# Altium PCB 16MV1.PcbDoc (part 1 of 3)
Units mm, origin at the board's own origin, x right, y up, seen from the top; angles counter-clockwise.
Board outline 48 x 32 mm, 4 copper layers (Top Layer, Layer 1, Layer 2, Bottom Layer), stack 1.583 mm thick; 197 components, 152 nets, 778 pads, 395 vias.
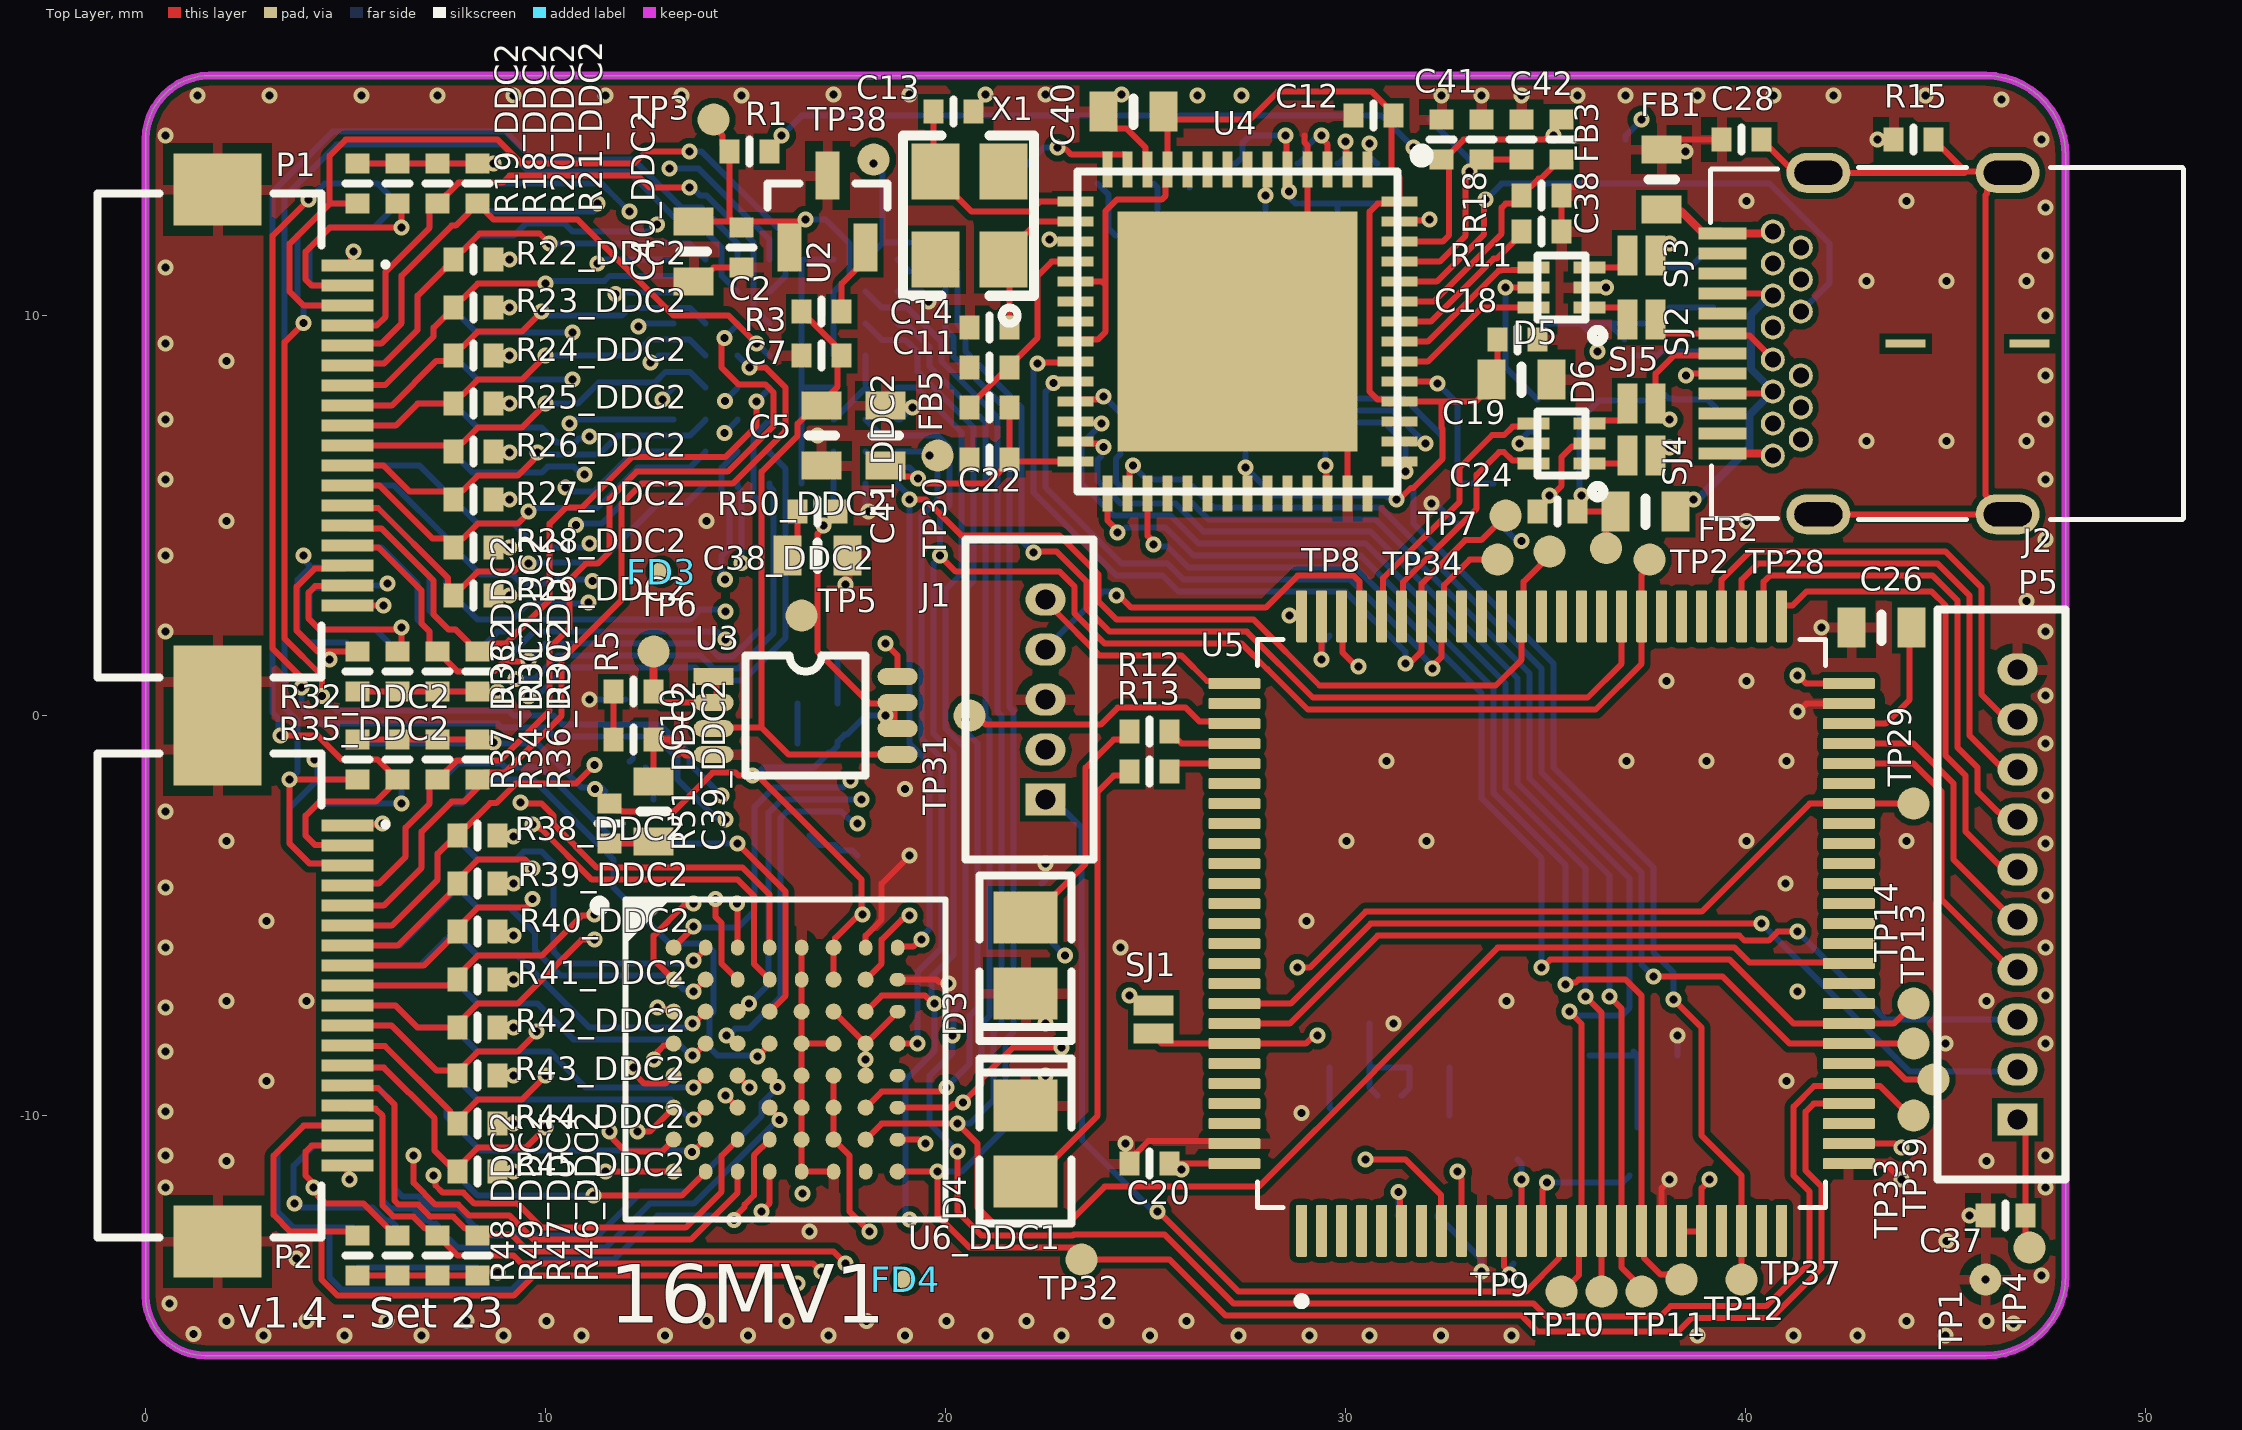
[diagram p0: Top Layer view]
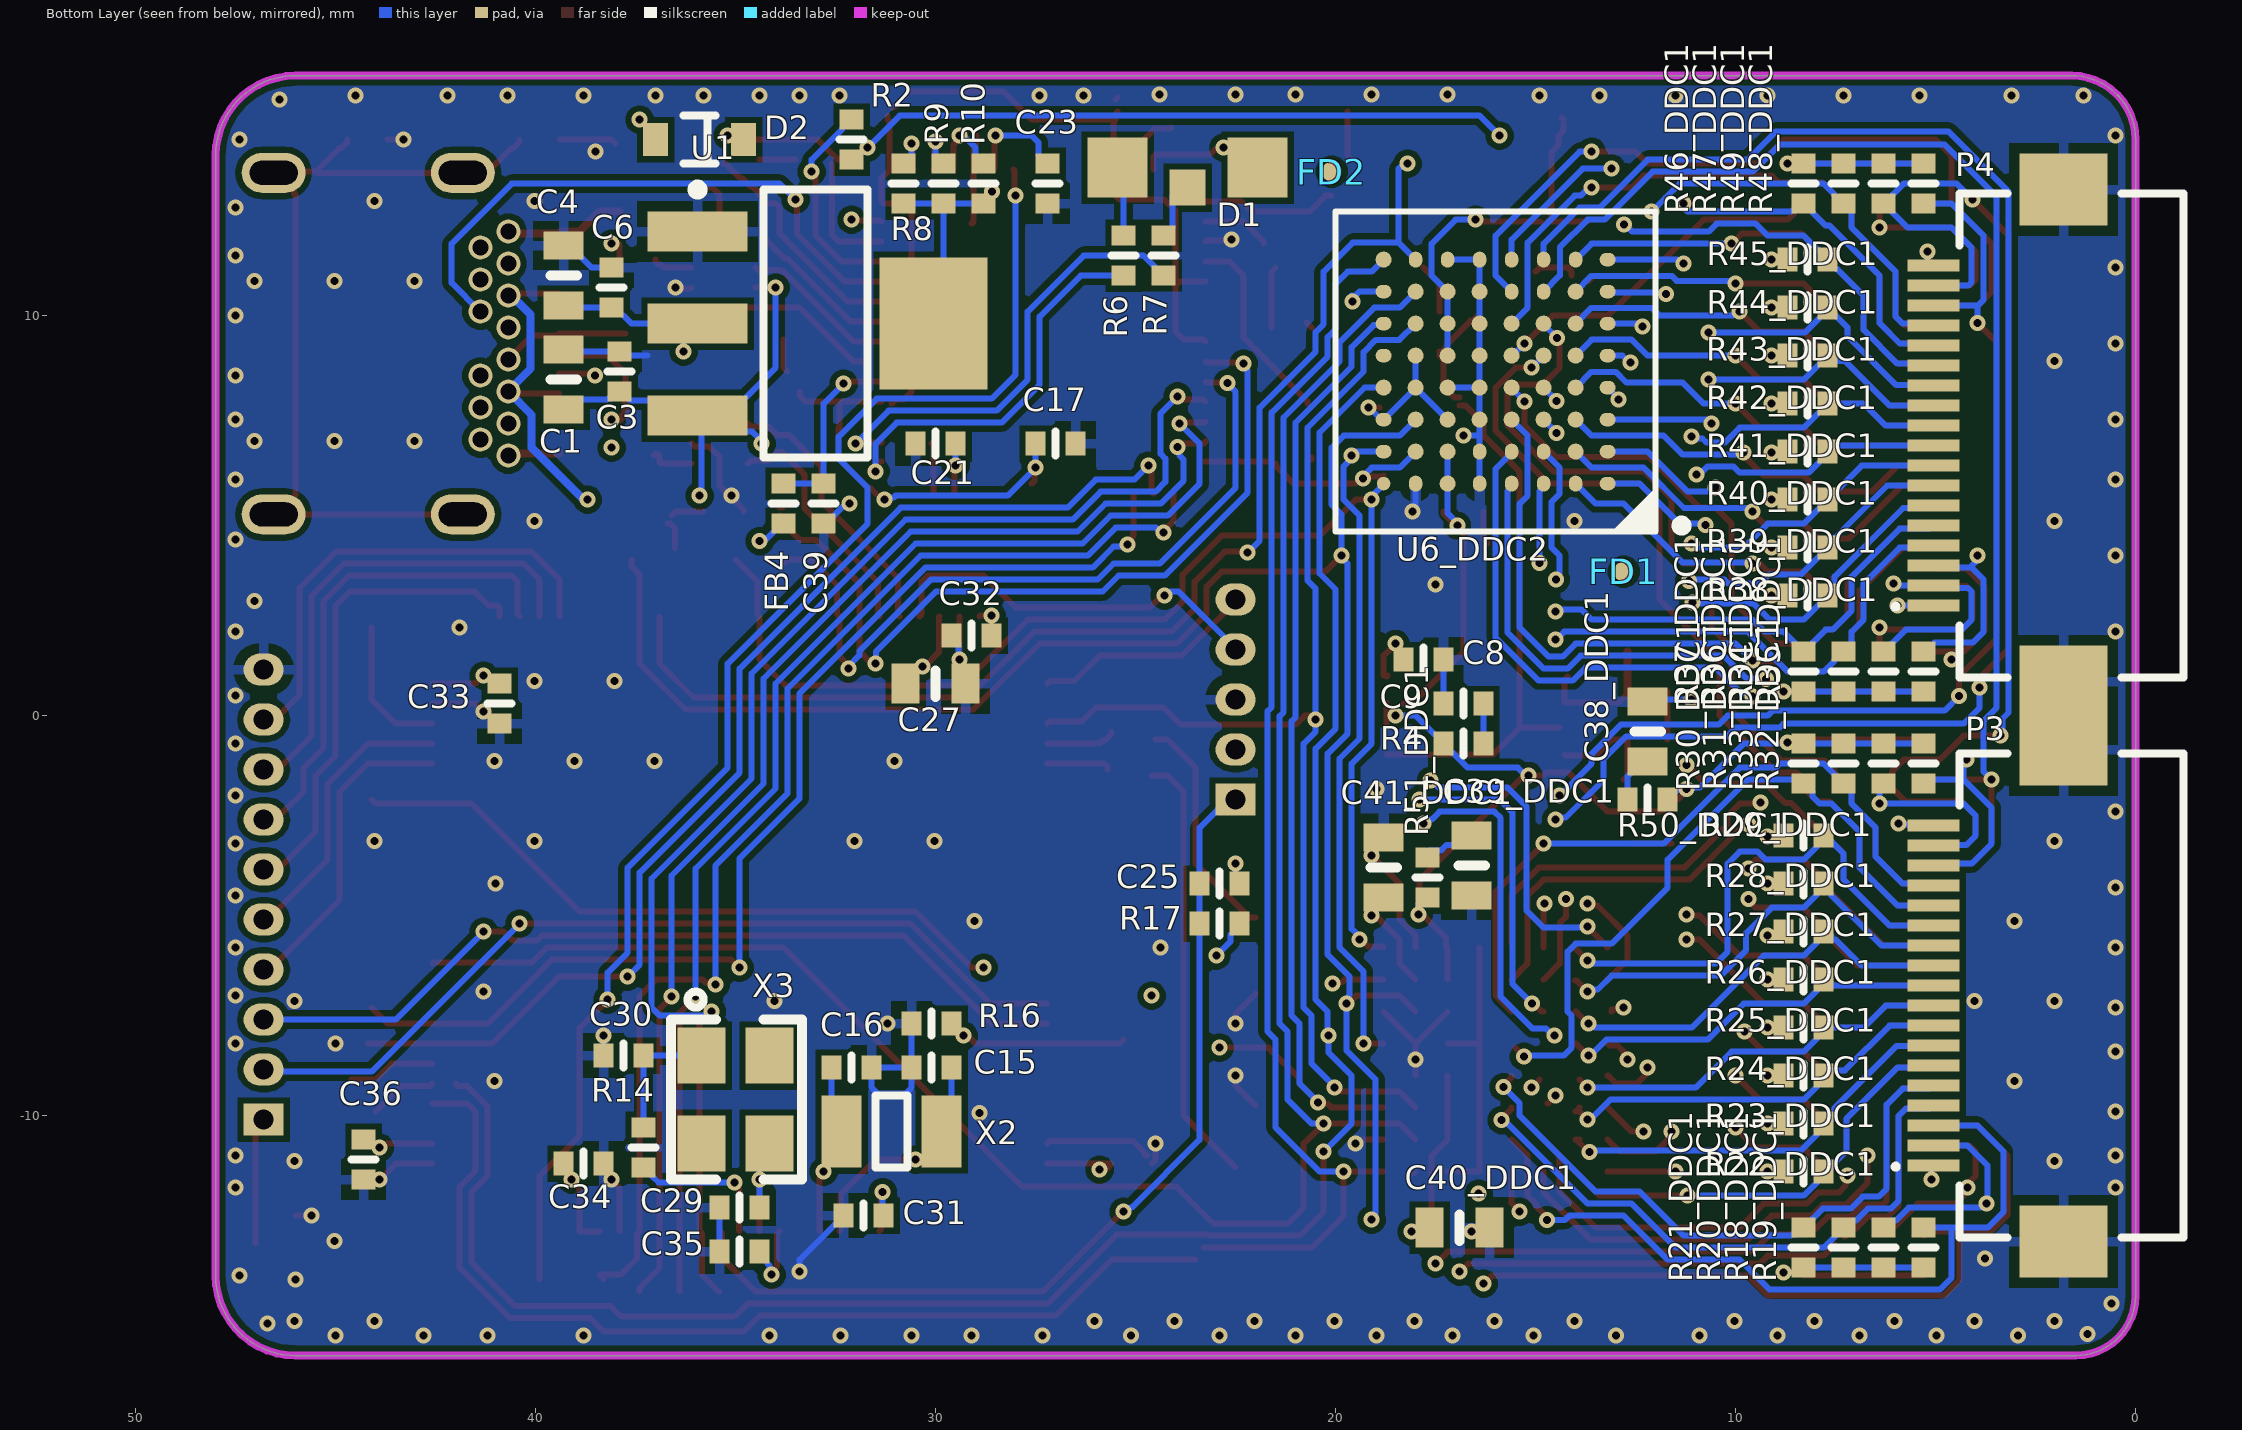
[diagram p1: Bottom Layer view, seen from below]
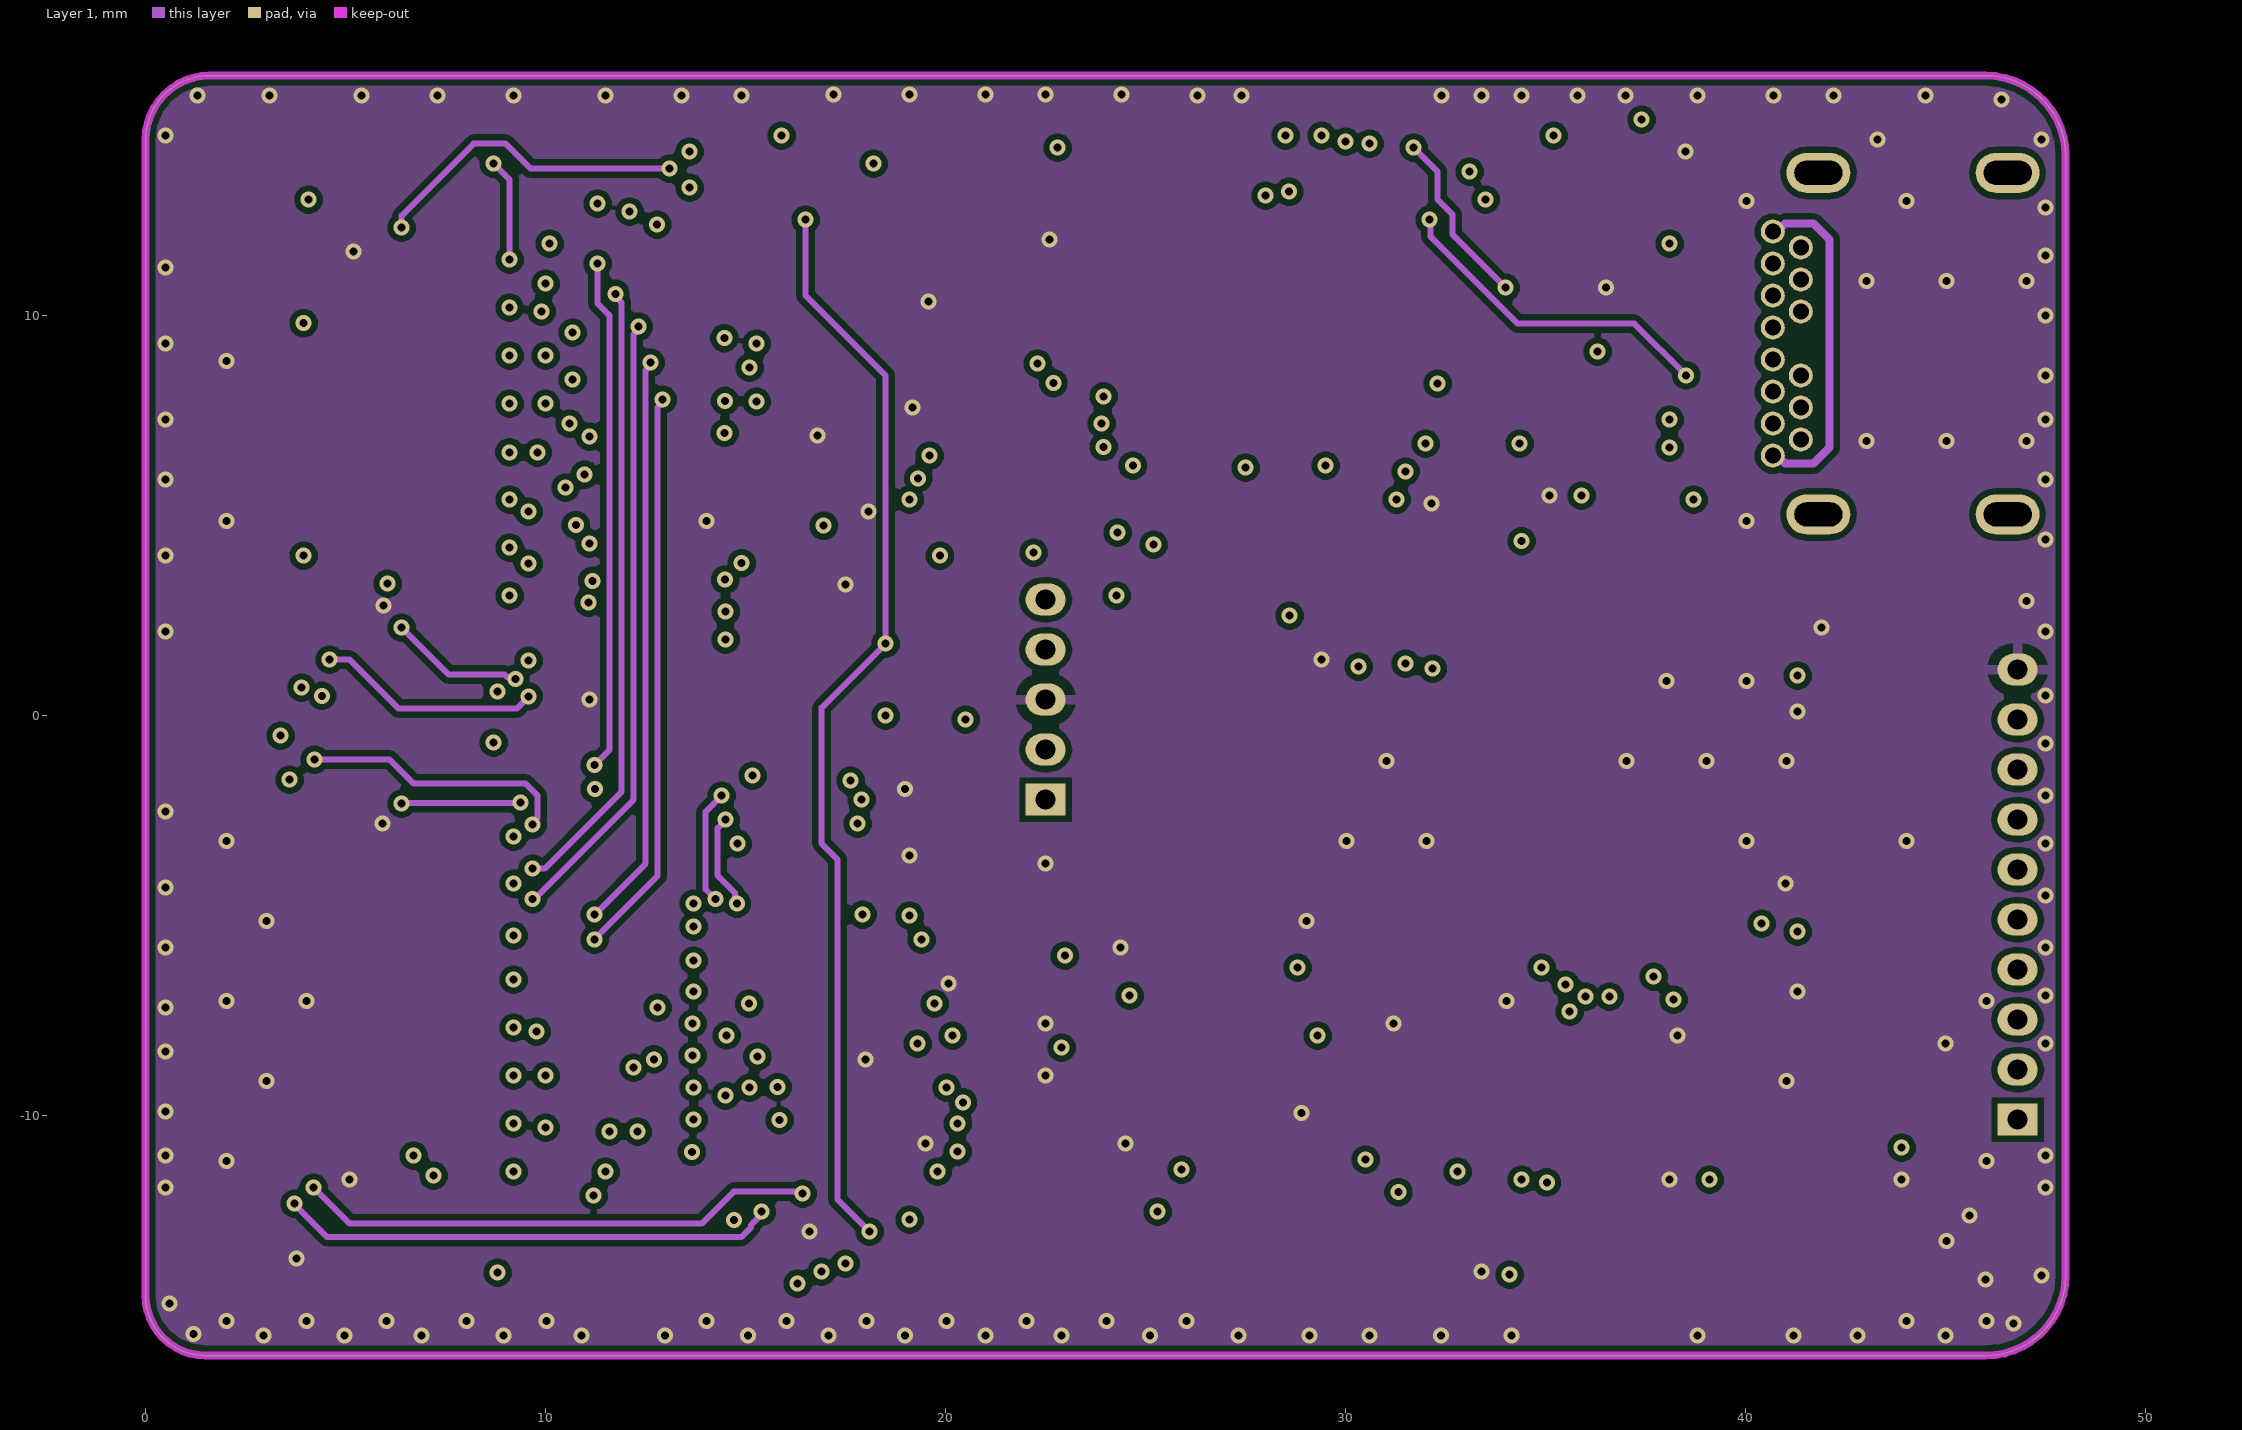
[diagram p2: Layer 1]
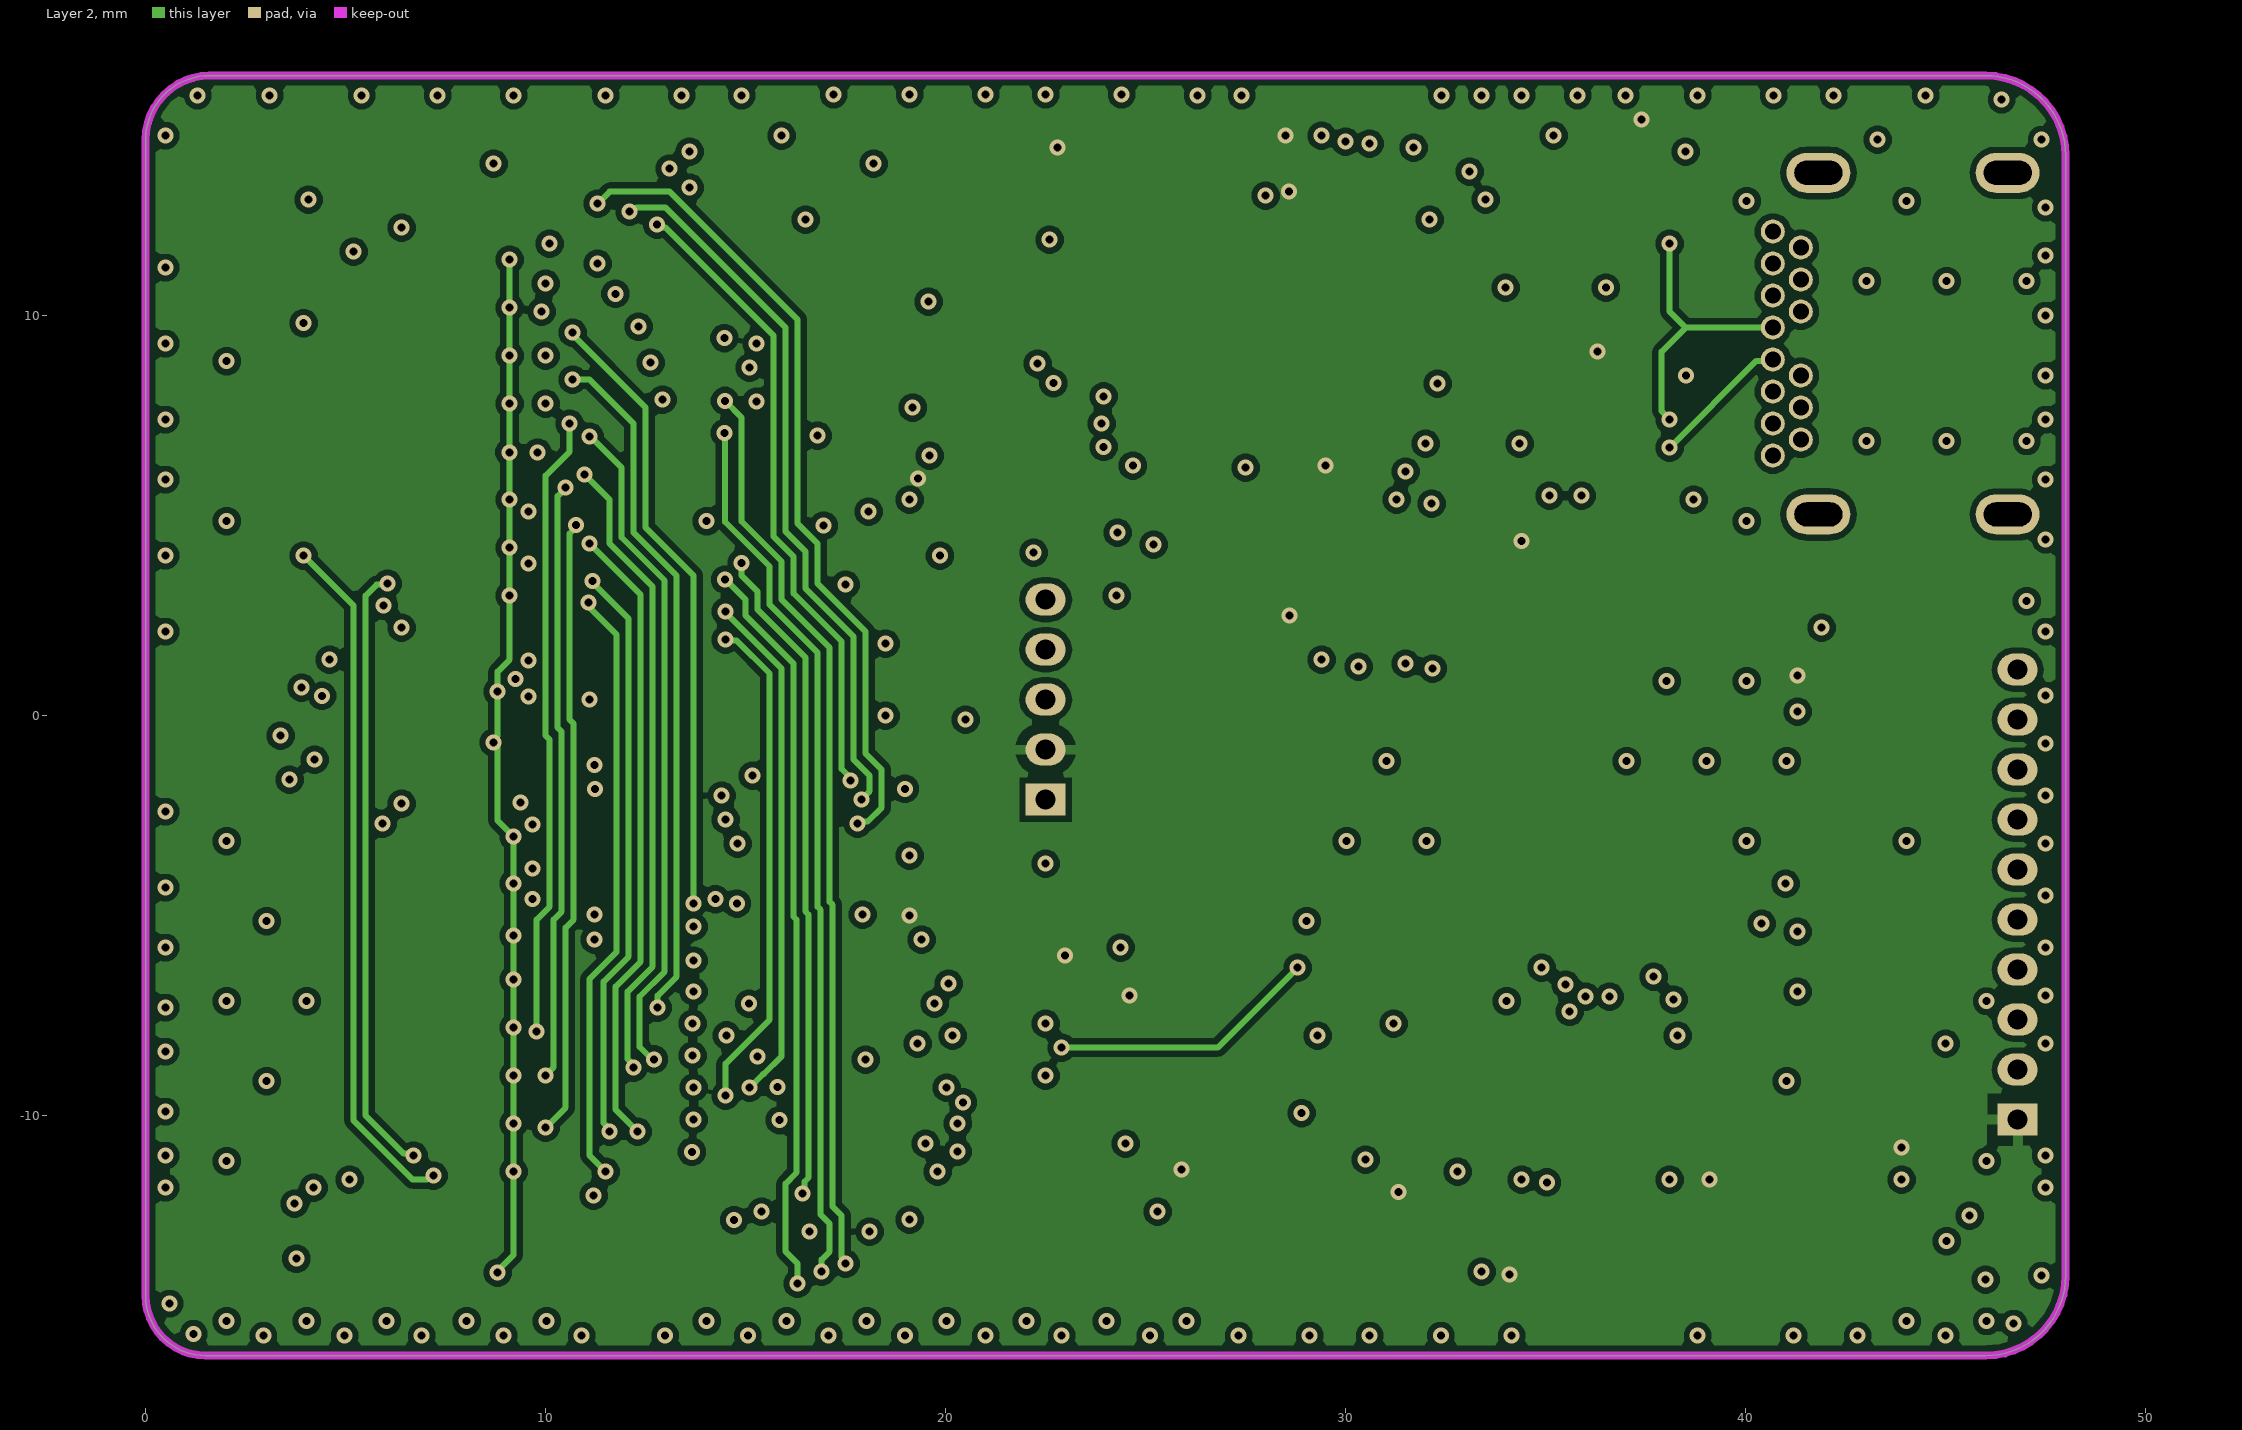
[diagram p3: Layer 2]

## Layer stack, top to bottom
Top Solder: solder mask 0.0102, Solder Resist, Dk 3.5
Top Layer: signal copper 0.0356
Dielectric 1: prepreg 0.0711, PP-006, Dk 4.1
Layer 1: signal copper 0.035
Dielectric1: core 1.3, FR-4, Dk 4.8
Layer 2: signal copper 0.035
Dielectric 2: prepreg 0.0711, PP-006, Dk 4.1
Bottom Layer: signal copper 0.0356
Bottom Solder: solder mask 0.0102, Solder Resist, Dk 3.5

## Board outline
1.5,-16 cw(c1.5,-14.5) 0,-14.5 0,14.4 cw(c1.6,14.4) 1.6,16 46,16 cw(c46,14) 48,14 48,-14 cw(c46,-14) 46,-16

## Design rules (kind name [scope] priority, off if disabled: settings)
Clearance [All] p1: gap=0.15 ignorepadtopadclearanceinfootprint=FALSE
DiffPairsRouting [All] p1: maxlimit=0.3 minlimit=0.2 mostfreqgap=0.2 toplayer_minwidth=0.2 toplayer_maxwidth=1 toplayer_prefwidth=0.2 midlayer1_minwidth=0.2 midlayer1_maxwidth=1 midlayer1_prefwidth=0.2 midlayer2_minwidth=0.2 midlayer2_maxwidth=1 midlayer2_prefwidth=0.2 bottomlayer_minwidth=0.2 bottomlayer_maxwidth=1 bottomlayer_prefwidth=0.2 maxuncoupledlength=12.7
HoleSize [All] p1: absolutevalues=TRUE maxlimit=10 minlimit=0.025 maxpercent=80.000 minpercent=20.000
MinimumSolderMaskSliver [All] p1: minsoldermaskwidth=0
PolygonConnect PolygonConnect_1 [(InComponentClass('All Components'))] p1: connectstyle=Relief reliefconductorwidth=0.254 reliefentries=4 polygonreliefangle="90 Angle" airgapwidth=0.254
PolygonConnect [All] p2: connectstyle=Direct reliefconductorwidth=0.254 reliefentries=4 polygonreliefangle="90 Angle" airgapwidth=0.254
RoutingVias [All] p1: holewidth=0.3 width=0.6 viastyle="Through Hole" minholewidth=0.2 minwidth=0.4 maxholewidth=1 maxwidth=2
SilkToSilkClearance [All] p1: silktosilkclearance=-10
SilkToSolderMaskClearance SilkscreenOverComponentPads [IsPad] p1: minsilkscreentomaskgap=-10 clearancetoexposedcopper=TRUE
SolderMaskExpansion [All] p1: expansion=0.102 istentingtop=FALSE
Width [All] p1: maxlimit=2 minlimit=0.15 preferedwidth=0.3
25 further rules are at their usual default settings.

## Classes and differential pairs
component class 16MV1: C1 C2 C3 C4 C5 C6 C7 C8 C9 C10 C11 C12 C13 C14 C15 C16 C17 C18 C19 C20 C21 C22 C23 C24 C25 C26 C27 C28 C29 C30 C31 C32 C33 C34 C35 C36 C37 C38 C39 C40 C41 C42 D1 D2 D3 D4 D5 D6 FB1 FB2 FB3 FB4 FB5 FD1 FD2 FD3 FD4 J1 J2 P1 P2 P3 P4 R1 R2 R3 R4 R5 R6 R7 R8 R9 R10 R11 R12 R13 R14 R15 R16 R17 R18 SJ1 SJ2 SJ3 SJ4 SJ5 TP1 TP2 TP3 TP4 TP5 TP6 TP7 TP8 TP9 TP10 TP11 TP12 TP13 TP14 TP28 TP29 TP30 TP31 TP32 TP33 TP34 TP37 TP38 TP39 U1 U2 U3 U4 U5 X1 X2 X3
channel class DDC: DDC1 DDC2
component class DDC1: C38_DDC1 C39_DDC1 C40_DDC1 C41_DDC1 R18_DDC1 R19_DDC1 R20_DDC1 R21_DDC1 R22_DDC1 R23_DDC1 R24_DDC1 R25_DDC1 R26_DDC1 R27_DDC1 R28_DDC1 R29_DDC1 R30_DDC1 R31_DDC1 R32_DDC1 R33_DDC1 R34_DDC1 R35_DDC1 R36_DDC1 R37_DDC1 R38_DDC1 R39_DDC1 R40_DDC1 R41_DDC1 R42_DDC1 R43_DDC1 R44_DDC1 R45_DDC1 R46_DDC1 R47_DDC1 R48_DDC1 R49_DDC1 R50_DDC1 R51_DDC1 U6_DDC1
component class DDC2: C38_DDC2 C39_DDC2 C40_DDC2 C41_DDC2 R18_DDC2 R19_DDC2 R20_DDC2 R21_DDC2 R22_DDC2 R23_DDC2 R24_DDC2 R25_DDC2 R26_DDC2 R27_DDC2 R28_DDC2 R29_DDC2 R30_DDC2 R31_DDC2 R32_DDC2 R33_DDC2 R34_DDC2 R35_DDC2 R36_DDC2 R37_DDC2 R38_DDC2 R39_DDC2 R40_DDC2 R41_DDC2 R42_DDC2 R43_DDC2 R44_DDC2 R45_DDC2 R46_DDC2 R47_DDC2 R48_DDC2 R49_DDC2 R50_DDC2 R51_DDC2 U6_DDC2
differential pair USB: +USB_P -USB_N
differential pair D: +D_P -D_N

## Components (designator, comment, footprint, x,y, rotation, side; value= is the part's Value field where it differs from the comment)
C1 "10u" 0603 39.3,8.4 r90 bottom
C2 "100n" 0402 14.9,11.7 r270 top
C3 "100n" 0402 37.9,8.6 r90 bottom
C4 "10u" 0603 39.3,11 r90 bottom
C5 "10u" 0603 16.9,7 r270 top
C6 "100n" 0402 38.1,10.7 r90 bottom
C7 "100n" 0402 16.9,9 r180 top
C8 "100n" 0402 17.8,1.4 r180 bottom
C9 "100n" 0402 16.8,0.3 r0 bottom
C10 "100n" 0402 12.2,-0.6 r0 top
C11 "100n" 0402 21.1,8.7 r180 top
C12 "100n" 0402 30.7,15 r180 top
C13 "18p" 0402 20.2,15.1 r180 top
C14 "18p" 0402 21.1,9.7 r0 top
C15 "18p" 0402 30.1,-8.8 r0 bottom
C16 "18p" 0402 32.1,-8.8 r180 bottom
C17 "100n" 0402 27,6.8 r180 bottom
C18 "100n" 0402 34.3,9.4 r0 top
C19 "10u" 0603 34.4,8.4 r180 top
C20 "100n" 0402 25.1,-11.2 r180 top
C21 "100n" 0402 30,6.8 r0 bottom
C22 "100n" 0402 21.1,6.4 r180 top
C23 "100n" 0402 27.2,13.3 r270 bottom
C24 "100n" 0402 35.3,5.1 r180 top
C25 "100n" 0402 22.9,-4.2 r180 bottom
C26 "10u" 0603 43.4,2.2 r0 top
C27 "10u" 0603 30,0.8 r0 bottom
C28 "100n" 0402 39.9,14.4 r180 top
C29 "18p" 0402 34.9,-12.3 r180 bottom
C30 "18p" 0402 37.8,-8.5 r180 bottom
C31 "100n" 0402 31.8,-12.5 r0 bottom
C32 "100n" 0402 29.1,2 r0 bottom
C33 "100n" 0402 40.9,0.3 r270 bottom
C34 "100n" 0402 38.8,-11.2 r180 bottom
C35 "100n" 0402 34.9,-13.4 r0 bottom
C36 "100n" 0402 44.3,-11.1 r270 bottom
C37 "100n" 0402 46.5,-12.5 r180 top
C38 "100n" 0402 34.9,13 r0 top
C38_DDC1 "10u" 0603 12.2,-0.4 r90 bottom (schematic designator C38)
C38_DDC2 "10u" 0603 16.8,4 r0 top (schematic designator C38)
C39 "100n" 0402 32.8,5.3 r270 bottom
C39_DDC1 "10u" 0603 16.6,-3.75 r270 bottom (schematic designator C39)
C39_DDC2 "10u" 0603 12.7,-2.4 r90 top (schematic designator C39)
C40 "10u" 0603 24.7,15.1 r0 top
C40_DDC1 "10u" 0603 16.9,-12.8 r0 bottom (schematic designator C40)
C40_DDC2 "10u" 0603 13.7,11.6 r90 top (schematic designator C40)
C41 "100n" 0402 32.4,14.4 r270 top
C41_DDC1 "10u" 0603 18.8,-3.8 r270 bottom (schematic designator C41)
C41_DDC2 "10u" 0603 18.5,7 r270 top (schematic designator C41)
C42 "18p" 0402 34.4,14.4 r270 top value=33n
D1 "LTST-S115TGKFKT" "LED BICOLOR R/A SMD" 23.7,13.7 r180 bottom
D2 "PMEG4010BEA" SOD-323 35.9,14.4 r180 bottom
D3 "LED BIANCO" LED_SMD 22,-6 r270 top
D4 "LED BLU" LED_SMD 22,-10.7 r90 top
D5 "82400152" SOT-666 35.4,10.7 r90 top
D6 "82400152" SOT-666 35.4,6.8 r90 top
FB1 "7427922808" 0603 37.9,13.4 r90 top
FB2 "7427922808" 0603 37.5,5.1 r0 top
FB3 "7427922808" 0402 35.4,14.4 r90 top
FB4 "7427922808" 0402 33.8,5.3 r270 bottom
FB5 "7427922808" 0402 21.1,7.7 r0 top
FD1 "Fiducial" FIDUCIAL 12.8,3.6 r180 bottom
FD2 "Fiducial" FIDUCIAL 20.1,13.6 r180 bottom
FD3 "Fiducial" FIDUCIAL 12.9,3.6 r0 top
FD4 "Fiducial" FIDUCIAL 19,-14.1 r0 top
J1 "530470510" MOLEX_5_V 22.5,-2.1 r90 top
J2 "632723100011" 632723100011 47.9,9.3 r90 top
P1 "FH12-18S-0.5SH(55)" FH12-18S-0.5SH(55) 4.4,7 r270 top
P2 "FH12-18S-0.5SH(55)" FH12-18S-0.5SH(55) 4.4,-7 r270 top
P3 "FH12-18S-0.5SH(55)" FH12-18S-0.5SH(55) 4.4,-7 r90 bottom
P4 "FH12-18S-0.5SH(55)" FH12-18S-0.5SH(55) 4.4,7 r90 bottom
P5 "530471010" MOLEX_10_V 46.8,-4.475 r90 top
R1 "0R" 0402 15.1,14.1 r0 top
R2 "100k" 0402 32.1,14.4 r270 bottom value=10k
R3 "1k" 0402 16.9,10.1 r0 top
R4 "0R68" 0402 16.8,-0.7 r0 bottom
R5 "0R68" 0402 12.2,0.6 r0 top
R6 "1k" 0402 25.3,11.5 r270 bottom
R7 "1k" 0402 24.3,11.5 r270 bottom
R8 "12k" 0402 30.8,13.3 r270 bottom value=10k
R9 "12k" 0402 29.8,13.3 r270 bottom value=10k
R10 "12k" 0402 28.8,13.3 r270 bottom value=10k
R11 "12k" 0402 34.9,12.1 r0 top value=10k
R12 "1k" 0402 25.1,-0.4 r0 top
R13 "1k" 0402 25.1,-1.4 r0 top
R14 "220R" 0402 37.3,-10.8 r90 bottom
R15 "12k" 0402 44.2,14.4 r0 top value=10k
R16 "22k" 0402 30.1,-7.7 r0 bottom
R17 "22k" 0402 22.9,-5.2 r180 bottom
R18 "15k" 0402 33.4,14.4 r270 top value=10k
R18_DDC1 "13M" 0402 6.3,-13.3 r270 bottom (schematic designator R18)
R18_DDC2 "13M" 0402 6.3,13.3 r90 top (schematic designator R18)
R19_DDC1 "13M" 0402 5.3,-13.3 r270 bottom (schematic designator R19)
R19_DDC2 "13M" 0402 5.3,13.3 r90 top (schematic designator R19)
R20_DDC1 "13M" 0402 7.3,-13.3 r270 bottom (schematic designator R20)
R20_DDC2 "13M" 0402 7.3,13.3 r90 top (schematic designator R20)
R21_DDC1 "13M" 0402 8.3,-13.3 r270 bottom (schematic designator R21)
R21_DDC2 "13M" 0402 8.3,13.3 r90 top (schematic designator R21)
R22_DDC1 "13M" 0402 8.3,-11.4 r0 bottom (schematic designator R22)
R22_DDC2 "13M" 0402 8.2,11.4 r0 top (schematic designator R22)
R23_DDC1 "13M" 0402 8.3,-10.2 r0 bottom (schematic designator R23)
R23_DDC2 "13M" 0402 8.2,10.2 r0 top (schematic designator R23)
R24_DDC1 "13M" 0402 8.3,-9 r0 bottom (schematic designator R24)
R24_DDC2 "13M" 0402 8.2,9 r0 top (schematic designator R24)
R25_DDC1 "13M" 0402 8.3,-7.8 r0 bottom (schematic designator R25)
R25_DDC2 "13M" 0402 8.2,7.8 r0 top (schematic designator R25)
R26_DDC1 "13M" 0402 8.3,-6.6 r0 bottom (schematic designator R26)
R26_DDC2 "13M" 0402 8.2,6.6 r0 top (schematic designator R26)
R27_DDC1 "13M" 0402 8.3,-5.4 r0 bottom (schematic designator R27)
R27_DDC2 "13M" 0402 8.2,5.4 r0 top (schematic designator R27)
R28_DDC1 "13M" 0402 8.3,-4.2 r0 bottom (schematic designator R28)
R28_DDC2 "13M" 0402 8.2,4.2 r0 top (schematic designator R28)
R29_DDC1 "13M" 0402 8.3,-3 r0 bottom (schematic designator R29)
R29_DDC2 "13M" 0402 8.2,3 r0 top (schematic designator R29)
R30_DDC1 "13M" 0402 8.3,-1.2 r90 bottom (schematic designator R30)
R30_DDC2 "13M" 0402 8.3,1.1 r270 top (schematic designator R30)
R31_DDC1 "13M" 0402 7.3,-1.2 r90 bottom (schematic designator R31)
R31_DDC2 "13M" 0402 7.3,1.1 r270 top (schematic designator R31)
R32_DDC1 "13M" 0402 5.3,-1.2 r90 bottom (schematic designator R32)
R32_DDC2 "13M" 0402 5.3,1.1 r270 top (schematic designator R32)
R33_DDC1 "13M" 0402 6.3,-1.2 r90 bottom (schematic designator R33)
R33_DDC2 "13M" 0402 6.3,1.1 r270 top (schematic designator R33)
R34_DDC1 "13M" 0402 6.3,1.1 r270 bottom (schematic designator R34)
R34_DDC2 "13M" 0402 6.3,-1.1 r90 top (schematic designator R34)
R35_DDC1 "13M" 0402 5.3,1.1 r270 bottom (schematic designator R35)
R35_DDC2 "13M" 0402 5.3,-1.1 r90 top (schematic designator R35)
R36_DDC1 "13M" 0402 7.3,1.1 r270 bottom (schematic designator R36)
R36_DDC2 "13M" 0402 7.3,-1.1 r90 top (schematic designator R36)
R37_DDC1 "13M" 0402 8.3,1.1 r270 bottom (schematic designator R37)
R37_DDC2 "13M" 0402 8.3,-1.1 r90 top (schematic designator R37)
R38_DDC1 "13M" 0402 8.2,3 r0 bottom (schematic designator R38)
R38_DDC2 "13M" 0402 8.3,-3 r0 top (schematic designator R38)
R39_DDC1 "13M" 0402 8.2,4.2 r0 bottom (schematic designator R39)
R39_DDC2 "13M" 0402 8.3,-4.2 r0 top (schematic designator R39)
R40_DDC1 "13M" 0402 8.2,5.4 r0 bottom (schematic designator R40)
R40_DDC2 "13M" 0402 8.3,-5.4 r0 top (schematic designator R40)
R41_DDC1 "13M" 0402 8.2,6.6 r0 bottom (schematic designator R41)
R41_DDC2 "13M" 0402 8.3,-6.6 r0 top (schematic designator R41)
R42_DDC1 "13M" 0402 8.2,7.8 r0 bottom (schematic designator R42)
R42_DDC2 "13M" 0402 8.3,-7.8 r0 top (schematic designator R42)
R43_DDC1 "13M" 0402 8.2,9 r0 bottom (schematic designator R43)
R43_DDC2 "13M" 0402 8.3,-9 r0 top (schematic designator R43)
R44_DDC1 "13M" 0402 8.2,10.2 r0 bottom (schematic designator R44)
R44_DDC2 "13M" 0402 8.3,-10.2 r0 top (schematic designator R44)
R45_DDC1 "13M" 0402 8.2,11.4 r0 bottom (schematic designator R45)
R45_DDC2 "13M" 0402 8.3,-11.4 r0 top (schematic designator R45)
R46_DDC1 "13M" 0402 8.3,13.3 r90 bottom (schematic designator R46)
R46_DDC2 "13M" 0402 8.3,-13.5 r270 top (schematic designator R46)
R47_DDC1 "13M" 0402 7.3,13.3 r90 bottom (schematic designator R47)
R47_DDC2 "13M" 0402 7.3,-13.5 r270 top (schematic designator R47)
R48_DDC1 "13M" 0402 5.3,13.3 r90 bottom (schematic designator R48)
R48_DDC2 "13M" 0402 5.3,-13.5 r270 top (schematic designator R48)
R49_DDC1 "13M" 0402 6.3,13.3 r90 bottom (schematic designator R49)
R49_DDC2 "13M" 0402 6.3,-13.5 r270 top (schematic designator R49)
R50_DDC1 "0R68" 0402 12.2,-2.1 r180 bottom (schematic designator R50)
R50_DDC2 "0R68" 0402 16.8,5.1 r0 top (schematic designator R50)
R51_DDC1 "0R68" 0402 17.7,-4.05 r270 bottom (schematic designator R51)
R51_DDC2 "0R68" 0402 11.6,-2.7 r90 top (schematic designator R51)
SJ1 "Sold Jum" SOLDERJUMPMINI 25.2,-7.6 r270 top
SJ2 "Sold Jum" SOLDERJUMPMINI 37.4,9.9 r180 top
SJ3 "Sold Jum" SOLDERJUMPMINI 37.4,11.5 r180 top
SJ4 "Sold Jum" SOLDERJUMPMINI 37.4,6.5 r180 top
SJ5 "Sold Jum" SOLDERJUMPMINI 37.4,7.8 r180 top
TP1 "TestPoint" PIAZZOLA 46,-14.1 r90 top
TP2 "TestPoint" PIAZZOLA 36.512,4.185 r90 top
TP3 "TestPoint" PIAZZOLA 14.2,14.9 r90 top
TP4 "TestPoint" PIAZZOLA 47.1,-13.3 r90 top
TP5 "TestPoint" PIAZZOLA 16.4,2.5 r90 top
TP6 "TestPoint" PIAZZOLA 12.7,1.6 r90 top
TP7 "TestPoint" PIAZZOLA 34,5 r90 top
TP8 "TestPoint" PIAZZOLA 33.8,3.9 r90 top
TP9 "TestPoint" PIAZZOLA 35.4,-14.4 r90 top
TP10 "TestPoint" PIAZZOLA 36.4,-14.4 r90 top
TP11 "TestPoint" PIAZZOLA 37.4,-14.4 r90 top
TP12 "TestPoint" PIAZZOLA 38.4,-14.1 r90 top
TP13 "TestPoint" PIAZZOLA 44.2,-8.2 r90 top
TP14 "TestPoint" PIAZZOLA 44.2,-7.2 r90 top
TP28 "TestPoint" PIAZZOLA 37.6,3.9 r90 top
TP29 "TestPoint" PIAZZOLA 44.2,-2.2 r90 top
TP30 "TestPoint" PIAZZOLA 19.8,6.5 r90 top
TP31 "TestPoint" PIAZZOLA 20.6,0 r90 top
TP32 "TestPoint" PIAZZOLA 23.4,-13.6 r90 top
TP33 "TestPoint" PIAZZOLA 44.2,-10 r90 top
TP34 "TestPoint" PIAZZOLA 35.1,4.1 r90 top
TP37 "TestPoint" PIAZZOLA 39.9,-14.1 r90 top
TP38 "TestPoint" PIAZZOLA 18.2,13.9 r90 top
TP39 "TestPoint" PIAZZOLA 44.7,-9.1 r90 top
U1 "LD1117" SOT223-4M 33,9.8 r180 bottom locked
U2 "REF3040" SOT23-3L 17.05,12.6 r0 top
U3 "OPA2350" MSOP8 16.5,0 r0 top
U4 "FT232HPQ" QFN56 27.3,9.6 r270 top
U5 "STM32H742VGT6TR" QFP50P1600X1600X160-100N 34.9,-5.2 r90 top locked
U6_DDC1 "DDC232CKZXGT" TI-ZXG64#1 16,-8.6 r0 top (schematic designator U6)
U6_DDC2 "DDC232CKZXGT" TI-ZXG64#2 16,8.6 r0 bottom locked (schematic designator U6)
X1 "12MHz" XTAL_SMD3225 20.6,12.5 r180 top
X2 "32.768kHz" "XTAL FC-13" 31.1,-10.4 r180 bottom
X3 "8MHz" XTAL_SMD3225 35,-9.6 r180 bottom

## Footprints (in the part's own frame and the unit in brackets; to place one, negate y for a bottom-side part, rotate by r counter-clockwise, add the part's x,y. Pads: shape width x height; smd on the part's side, far side on the other; paste and mask are expansions set on the pad)
0402 [mm]
  rect 0.5x0.6 smd: 1(-0.5,0) 2(0.5,0)
  silkscreen extent 0,-0.3 0,0.3, body extent -0.5,-0.25 0.5,0.25, height 0.35
0603 [mm]
  rect 0.7x1 smd: 1(-0.75,0) 2(0.75,0)
  silkscreen extent 0,-0.33 0,0.33, body extent -0.85,-0.47 0.85,0.48, height 0.6
632723100011 [mm]
  rect 0.3x1.2 smd: A1(-2.75,8.48) A2(-2.25,8.48) A3(-1.75,8.48) A4(-1.25,8.48) A5(-0.75,8.48) A6(-0.25,8.48) A7(0.25,8.48) A8(0.75,8.48) A9(1.25,8.48) A10(1.75,8.48) A11(2.25,8.48) A12(2.75,8.48)
  round 0.6 hole 0.4: B1(2.8,7.22) B2(2.4,6.52) B3(1.6,6.52) B4(1.2,7.22) B5(0.8,6.52) B6(0.4,7.22) B7(-0.4,7.22) B8(-0.8,6.52) B9(-1.2,7.22) B10(-1.6,6.52) B11(-2.4,6.52) B12(-2.8,7.22) GND(-2,7.22) GND(2,7.22)
  oval 1x1.6 hole 0.6 slot 1.2 at 90 deg: Shell(-4.27,6.08) Shell(-4.27,1.35) Shell(4.27,6.08) Shell(4.27,1.35)
  rect 0.2x1 smd: ""(0,3.9) ""(0,0.8)
  silkscreen extent -4.4,-3.05 4.4,8.77, body extent -4.4,-3.02 4.34,8.77, height 3.08
FH12-18S-0.5SH(55) [mm]
  rect 0.3x1.3 smd: 1(-4.25,0.65) 2(-3.75,0.65) 3(-3.25,0.65) 4(-2.75,0.65) 5(-2.25,0.65) 6(-1.75,0.65) 7(-1.25,0.65) 8(-0.75,0.65) 9(-0.25,0.65) 10(0.25,0.65) 11(0.75,0.65) 12(1.25,0.65) 13(1.75,0.65) 14(2.25,0.65) 15(2.75,0.65) 16(3.25,0.65) 17(3.75,0.65) 18(4.25,0.65)
  rect 1.8x2.2 smd: 19(-6.15,-2.6) 20(6.15,-2.6)
  silkscreen extent -6.05,-5.6 6.05,1.62, body extent -6.54,-5.65 6.56,0.75, height 2.1
FIDUCIAL [mm]
  round 0.5 smd paste-0.5 mask+0.25: ""(0,0)
"LED BICOLOR R/A SMD" [mm]
  rect 1.5x1.5 smd: 1(1.75,0) 3(-1.75,0)
  rect 0.9x0.9 smd: 2(0,-0.5)
  body extent -1.6,-0.15 1.6,1.35, height 1
LED_SMD [mm]
  rect 1.3x1.6 smd: 1(-0.95,0) 2(0.95,0)
  silkscreen extent -2,-1.15 2.13,1.15, body extent -1.01,-0.63 1.01,0.62, height 1.1
MOLEX_5_V [mm]
  rect 0.8x1 hole 0.5: 1(0,0)
  oval 0.8x1 hole 0.5: 2(1.25,0) 3(2.5,0) 4(3.75,0) 5(5,0)
  silkscreen extent -1.5,-1.2 6.5,2
MOLEX_10_V [mm]
  rect 0.8x1 hole 0.5: 1(-5.625,0)
  oval 0.8x1 hole 0.5: 2(-4.375,0) 2(5.625,0) 3(-3.125,0) 4(-1.875,0) 5(-0.625,0) 6(0.625,0) 7(1.875,0) 8(3.125,0) 9(4.375,0)
  silkscreen extent -7.12,-1.2 7.12,2
MSOP8 [mm]
  rect 1x0.43 smd: 1(-2.3,0.975)
  oval 1x0.43 smd: 2(-2.3,0.325) 3(-2.3,-0.325) 4(-2.3,-0.975) 5(2.3,-0.975) 6(2.3,-0.325) 7(2.3,0.325) 8(2.3,0.975)
  silkscreen extent -1.5,-1.5 1.5,1.5, body extent -1.5,-1.5 1.5,1.5, height 1.1
PIAZZOLA [mm]
  round 0.8 smd: 1(0,0)
QFN56 [mm]
  rect 0.9x0.25 smd: 1(-4.05,3.25) 2(-4.05,2.75) 3(-4.05,2.25) 4(-4.05,1.75) 5(-4.05,1.25) 6(-4.05,0.75) 7(-4.05,0.25) 8(-4.05,-0.25) 9(-4.05,-0.75) 10(-4.05,-1.25) 11(-4.05,-1.75) 12(-4.05,-2.25) 13(-4.05,-2.75) 14(-4.05,-3.25) 29(4.05,-3.25) 30(4.05,-2.75) 31(4.05,-2.25) 32(4.05,-1.75) 33(4.05,-1.25) 34(4.05,-0.75) 35(4.05,-0.25) 36(4.05,0.25) 37(4.05,0.75) 38(4.05,1.25) 39(4.05,1.75) 40(4.05,2.25) 41(4.05,2.75) 42(4.05,3.25)
  rect 0.25x0.9 smd: 15(-3.25,-4.05) 16(-2.75,-4.05) 17(-2.25,-4.05) 18(-1.75,-4.05) 19(-1.25,-4.05) 20(-0.75,-4.05) 21(-0.25,-4.05) 22(0.25,-4.05) 23(0.75,-4.05) 24(1.25,-4.05) 25(1.75,-4.05) 26(2.25,-4.05) 27(2.75,-4.05) 28(3.25,-4.05) 43(3.25,4.05) 44(2.75,4.05) 45(2.25,4.05) 46(1.75,4.05) 47(1.25,4.05) 48(0.75,4.05) 49(0.25,4.05) 50(-0.25,4.05) 51(-0.75,4.05) 52(-1.25,4.05) 53(-1.75,4.05) 54(-2.25,4.05) 55(-2.75,4.05) 56(-3.25,4.05)
  rect 6x6 smd: TB(0,0)
  silkscreen extent -4.55,-4 4,4.75, body extent -4,-4 4,4, height 0.85
QFP50P1600X1600X160-100N [mm]
  rrect25% 1.3x0.28 smd: 1(-7.68,6) 2(-7.68,5.5) 3(-7.68,5) 4(-7.68,4.5) 5(-7.68,4) 6(-7.68,3.5) 7(-7.68,3) 8(-7.68,2.5) 9(-7.68,2) 10(-7.68,1.5) 11(-7.68,1) 12(-7.68,0.5) 13(-7.68,0) 14(-7.68,-0.5) 15(-7.68,-1) 16(-7.68,-1.5) 17(-7.68,-2) 18(-7.68,-2.5) 19(-7.68,-3) 20(-7.68,-3.5) 21(-7.68,-4) 22(-7.68,-4.5) 23(-7.68,-5) 24(-7.68,-5.5) 25(-7.68,-6) 51(7.68,-6) 52(7.68,-5.5) 53(7.68,-5) 54(7.68,-4.5) 55(7.68,-4) 56(7.68,-3.5) 57(7.68,-3) 58(7.68,-2.5) 59(7.68,-2) 60(7.68,-1.5) 61(7.68,-1) 62(7.68,-0.5) 63(7.68,0) 64(7.68,0.5) 65(7.68,1) 66(7.68,1.5) 67(7.68,2) 68(7.68,2.5) 69(7.68,3) 70(7.68,3.5) 71(7.68,4) 72(7.68,4.5) 73(7.68,5) 74(7.68,5.5) 75(7.68,6)
  rrect25% 0.28x1.3 smd: 26(-6,-7.68) 27(-5.5,-7.68) 28(-5,-7.68) 29(-4.5,-7.68) 30(-4,-7.68) 31(-3.5,-7.68) 32(-3,-7.68) 33(-2.5,-7.68) 34(-2,-7.68) 35(-1.5,-7.68) 36(-1,-7.68) 37(-0.5,-7.68) 38(0,-7.68) 39(0.5,-7.68) 40(1,-7.68) 41(1.5,-7.68) 42(2,-7.68) 43(2.5,-7.68) 44(3,-7.68) 45(3.5,-7.68) 46(4,-7.68) 47(4.5,-7.68) 48(5,-7.68) 49(5.5,-7.68) 50(6,-7.68) 76(6,7.68) 77(5.5,7.68) 78(5,7.68) 79(4.5,7.68) 80(4,7.68) 81(3.5,7.68) 82(3,7.68) 83(2.5,7.68) 84(2,7.68) 85(1.5,7.68) 86(1,7.68) 87(0.5,7.68) 88(0,7.68) 89(-0.5,7.68) 90(-1,7.68) 91(-1.5,7.68) 92(-2,7.68) 93(-2.5,7.68) 94(-3,7.68) 95(-3.5,7.68) 96(-4,7.68) 97(-4.5,7.68) 98(-5,7.68) 99(-5.5,7.68) 100(-6,7.68)
  silkscreen extent -9.54,-7.1 7.1,7.1, body extent -8,-8 8,8, height 1.61
SOD-323 [mm]
  rect 0.63x0.83 smd: 1(-1.1,0) 2(1.1,0)
  silkscreen extent -0.4,-0.6 0.4,0.6, body extent -1,-0.7 0.9,0.7, height 0.9
SOLDERJUMPMINI [mm]
  rect 0.5x1 smd: 1(-0.35,0) 2(0.35,0)
SOT23-3L [mm]
  rect 0.6x1.2 smd: 1(-0.95,-0.9) 2(0.95,-0.9) 3(0,0.9)
  silkscreen extent -1.5,0.1 1.5,0.7, body extent -1.5,-1.25 1.5,1.3, height 1
SOT223-4M [mm] "SOT223, 4-Leads, Body 6.5x3.5mm, Pitch 2.3mm, Lead Span 7mm, IPC Low Density"
  rect 2.5x1 smd: 1(-2.95,2.3) 2(-2.95,0) 3(-2.95,-2.3)
  rect 2.7x3.3 smd: 4(2.95,0)
  silkscreen extent -3.08,-3.35 1.3,3.47, body extent -1.85,-3.35 1.85,3.35, height 1.8
SOT-666 [mm]
  rect 0.3x0.8 smd: 1(-0.5,-0.7) 2(0,-0.7) 3(0.5,-0.7) 4(0.5,0.7) 5(0,0.7) 6(-0.5,0.7)
  silkscreen extent -1.34,-1.04 0.8,0.6, body extent -0.8,-0.8 0.8,0.8, height 0.6
TI-ZXG64#1 [mm]
  round 0.4 smd: A1(-2.8,2.8) A6(1.2,2.8) B1(-2.8,2) B2(-2,2) B6(1.2,2) B7(2,2) C1(-2.8,1.2) C2(-2,1.2) C3(-1.2,1.2) C4(-0.4,1.2) C5(0.4,1.2) C6(1.2,1.2) C7(2,1.2) D1(-2.8,0.4) D2(-2,0.4) D3(-1.2,0.4) D4(-0.4,0.4) D5(0.4,0.4) D6(1.2,0.4) D7(2,0.4) D8(2.8,0.4) E1(-2.8,-0.4) E2(-2,-0.4) E3(-1.2,-0.4) E4(-0.4,-0.4) E5(0.4,-0.4) E6(1.2,-0.4) E7(2,-0.4) F1(-2.8,-1.2) F2(-2,-1.2) F3(-1.2,-1.2) F4(-0.4,-1.2) F5(0.4,-1.2) F6(1.2,-1.2) F7(2,-1.2) G1(-2.8,-2) G2(-2,-2) G5(0.4,-2) G6(1.2,-2) G7(2,-2) H1(-2.8,-2.8) H8(2.8,-2.8)
  oval 0.34x0.4 smd: A2(-2,2.8) A3(-1.2,2.8) A4(-0.4,2.8) A5(0.4,2.8) A7(2,2.8) A8(2.8,2.8) B3(-1.2,2) B4(-0.4,2) B5(0.4,2) G3(-1.2,-2) G4(-0.4,-2) H2(-2,-2.8) H3(-1.2,-2.8) H4(-0.4,-2.8) H5(0.4,-2.8) H6(1.2,-2.8) H7(2,-2.8)
  oval 0.4x0.34 smd: B8(2.8,2) C8(2.8,1.2) E8(2.8,-0.4) F8(2.8,-1.2) G8(2.8,-2)
  silkscreen extent -4.77,-4 4,4, body extent -4,-4 4,4, height 1.45
TI-ZXG64#2 [mm]
  oval 0.4x0.34 smd: A1(-2.8,2.8) B1(-2.8,2) B8(2.8,2) C1(-2.8,1.2) C8(2.8,1.2) D1(-2.8,0.4) E1(-2.8,-0.4) E8(2.8,-0.4) F1(-2.8,-1.2) F8(2.8,-1.2) G1(-2.8,-2) G8(2.8,-2) H1(-2.8,-2.8)
  oval 0.34x0.4 smd: A2(-2,2.8) A3(-1.2,2.8) A4(-0.4,2.8) A5(0.4,2.8) A7(2,2.8) B3(-1.2,2) B4(-0.4,2) B5(0.4,2) G3(-1.2,-2) G4(-0.4,-2) H2(-2,-2.8) H3(-1.2,-2.8) H4(-0.4,-2.8) H5(0.4,-2.8) H6(1.2,-2.8) H7(2,-2.8)
  round 0.4 smd: A6(1.2,2.8) B2(-2,2) B6(1.2,2) B7(2,2) C2(-2,1.2) C3(-1.2,1.2) C4(-0.4,1.2) C5(0.4,1.2) C6(1.2,1.2) C7(2,1.2) D2(-2,0.4) D3(-1.2,0.4) D4(-0.4,0.4) D5(0.4,0.4) D6(1.2,0.4) D7(2,0.4) D8(2.8,0.4) E2(-2,-0.4) E3(-1.2,-0.4) E4(-0.4,-0.4) E5(0.4,-0.4) E6(1.2,-0.4) E7(2,-0.4) F2(-2,-1.2) F3(-1.2,-1.2) F4(-0.4,-1.2) F5(0.4,-1.2) F6(1.2,-1.2) F7(2,-1.2) G2(-2,-2) G5(0.4,-2) G6(1.2,-2) G7(2,-2) H8(2.8,-2.8)
  round 0.34 smd: A8(2.8,2.8)
  silkscreen extent -4.77,-4 4,4, body extent -4,-4 4,4, height 1.45
"XTAL FC-13" [mm]
  rect 1x1.8 smd: 1(-1.25,0) 2(1.25,0)
  silkscreen extent -0.4,-0.9 0.4,0.9, body extent -1.61,-0.76 1.61,0.76, height 0.59
XTAL_SMD3225 [mm]
  rect 1.2x1.4 smd: 1(-0.85,1.1) 2(-0.85,-1.1) 3(0.85,-1.1) 4(0.85,1.1)
  silkscreen extent -1.61,-2 1.66,2.7, body extent -1.25,-1.6 1.25,1.6, height 0.61

## Part data
C1 C4 C5 C19 C26 C27 C38_DDC1 C38_DDC2 C39_DDC1 C39_DDC2 C40 C40_DDC1 C40_DDC2 C41_DDC1 C41_DDC2: library part "Cap 10uF", "Capacitor X5R 6.3V 10%", LatestRevisionDate=17-Jul-2002, LatestRevisionNote="Re-released for DXP Platform.", Published=8-Jun-2000, Publisher="Altium Limited"
C2 C3 C6 C7 C8 C9 C10 C11 C12 C17 C18 C20 C21 C22 C23 C24 C25 C28 C31 C32 C33 C34 C35 C36 C37 C38 C39 C41: library part "Cap 100nF", "Capacitor X7R 50V 10%", LatestRevisionDate=17-Jul-2002, LatestRevisionNote="Re-released for DXP Platform.", Published=8-Jun-2000, Publisher="Altium Limited"
  C31 C32 C33 C34 C35 C36 C37: PackageDescription="Radial Cap, Thru-Hole; 2 Leads; 0.3 in Pin Spacing", PackageReference=RAD-0.3
C13 C14 C15 C16 C29 C30 C42: library part "Cap 18pF", "Capacitor COG 50V 10%", LatestRevisionDate=17-Jul-2002, LatestRevisionNote="Re-released for DXP Platform.", PackageDescription="Radial Cap, Thru-Hole; 2 Leads; 0.3 in Pin Spacing", PackageReference=RAD-0.3, Published=8-Jun-2000, Publisher="Altium Limited"
D1: library part "Led Bicolor 4", "Led bicolor Right angle", Supplier Part Number 1=8530165, Supplier 1=Farnell
D2: "Schottky Diode", Supplier Part Number 1=1727-5211-6-ND, Code - JEDEC=DO-214-AA, Produttore="ON SEMICONDUCTOR", Published=8-Jun-2000, Publisher="Altium Limited", Revision="July-2002: Re-released for DXP Platform.", Supplier 1=Digi-Key, Supplier 2=Mouser, Supplier Part Number 2=771-PMEG4010BEAT/R
D3: "LED, QuasarBrite, bianco, SMD, 2mm x 1,6mm, 20 mA, 3.5 V, 90 mcd", Supplier Part Number 1=67-1866-1-ND, Supplier 1=Digi-Key, Supplier 2=Farnell, Supplier Part Number 2=2062228
D4: "LED, BLUE, 3.2MM X 1.6MM, 25MCD, 470NM", Supplier Part Number 1=67-1701-1-ND, Supplier 1=Digi-Key, Supplier 2=Farnell, Supplier Part Number 2=1020463
D5 D6: "WE-TVS TVS Diode – High speed Series", Supplier Part Number 1=732-4474-1-ND, Supplier 1=Digi-Key, Supplier 2=Farnell, Supplier Part Number 2=1825874
FB1 FB2 FB3 FB4 FB5: "Ferrite bead", Supplier Part Number 1=732-6114-1-ND, Supplier 1=Digi-Key, Supplier 2=Farnell, Supplier Part Number 2=2467183
J1: library part "Header 5", "Header, 5-Pin", Supplier Part Number 1=WM1734-ND, Supplier 1=Digi-Key, Supplier 2=Farnell, Supplier Part Number 2=9732861
J2: "USB 3.1 Type C Receptacle Horizontal THR WR-COM", Supplier Part Number 1=732-9617-1-ND, ComponentLink1Description=Manufacturer, ComponentLink1URL=http://www.we-online.de, ComponentLink2Description=Datasheet, ComponentLink2URL=http://katalog.we-online.de/em/datasheet/632723x00011.pdf, Construction=THR, Gender=Receptacle, Interface Type="Type C", Part Number=632723100011, Published Date="April 2017", Publisher="Wurth Elektronik", Sub-Family="USB 3.1", Supplier 1=Digi-Key, Supplier 2=Farnell, Supplier Part Number 2=2984360, Type=Horizontal
P1 P2 P3 P4: "Header, 18-Pin", Supplier Part Number 1=HFJ118CT-ND, LatestRevisionDate=17-Jul-2002, LatestRevisionNote="Re-released for DXP Platform.", Publisher="Altium Limited", Supplier 1=Digi-Key, Supplier 2=RSComponents, Supplier Part Number 2=7388824
P5: library part "Header 10", "Header, 10-Pin", Supplier Part Number 1=WM1739-ND, LatestRevisionDate=17-Jul-2002, LatestRevisionNote="Re-released for DXP Platform.", Publisher="Altium Limited", Supplier 1=Digi-Key, Supplier 2=Farnell, Supplier Part Number 2=9733086
R1: library part "Res 0R", "Resistor 0.1W 1%", LatestRevisionDate=17-Jul-2002, LatestRevisionNote="Re-released for DXP Platform.", PackageDescription="Axial Device, Thru-Hole; 2 Leads; 0.3 in Pin Spacing", PackageReference=AXIAL-0.3, Published=8-Jun-2000, Publisher="Altium Limited"
R2 R8 R9 R10 R11 R15 R18: library part "Res 12k", "Resistor 0.1W 1%", LatestRevisionDate=17-Jul-2002, LatestRevisionNote="Re-released for DXP Platform.", PackageDescription="Axial Device, Thru-Hole; 2 Leads; 0.3 in Pin Spacing", PackageReference=AXIAL-0.3, Published=8-Jun-2000, Publisher="Altium Limited"
R3 R6 R7 R12 R13: library part "Res 1k", "Resistor 0.1W 1%", Published=8-Jun-2000, Publisher="Altium Limited"
  R3: LatestRevisionDate=17-Jul-2002, LatestRevisionNote="Re-released for DXP Platform.", PackageDescription="Axial Device, Thru-Hole; 2 Leads; 0.3 in Pin Spacing", PackageReference=AXIAL-0.3
  R6 R7 R12 R13: Revision="July-2002: Re-released for DXP Platform."
R4 R5 R50_DDC1 R50_DDC2 R51_DDC1 R51_DDC2: library part "Res 0R68", "Resistor 0.1W 1%", LatestRevisionDate=17-Jul-2002, LatestRevisionNote="Re-released for DXP Platform.", PackageDescription="Axial Device, Thru-Hole; 2 Leads; 0.3 in Pin Spacing", PackageReference=AXIAL-0.3, Published=8-Jun-2000, Publisher="Altium Limited"
R14: library part "Res 220R", "Resistor 0.1W 1%", LatestRevisionDate=17-Jul-2002, LatestRevisionNote="Re-released for DXP Platform.", PackageDescription="Axial Device, Thru-Hole; 2 Leads; 0.3 in Pin Spacing", PackageReference=AXIAL-0.3, Published=8-Jun-2000, Publisher="Altium Limited"
R16 R17: library part "Res 22k", "Resistor 0.1W 1%", LatestRevisionDate=17-Jul-2002, LatestRevisionNote="Re-released for DXP Platform.", Published=8-Jun-2000, Publisher="Altium Limited"
R18_DDC1 R18_DDC2 R19_DDC1 R19_DDC2 R20_DDC1 R20_DDC2 R21_DDC1 R21_DDC2 R22_DDC1 R22_DDC2 R23_DDC1 R23_DDC2 R24_DDC1 R24_DDC2 R25_DDC1 R25_DDC2 R26_DDC1 R26_DDC2 R27_DDC1 R27_DDC2 R28_DDC1 R28_DDC2 R29_DDC1 R29_DDC2 R30_DDC1 R30_DDC2 R31_DDC1 R31_DDC2 R32_DDC1 R32_DDC2 R33_DDC1 R33_DDC2 R34_DDC1 R34_DDC2 R35_DDC1 R35_DDC2 R36_DDC1 R36_DDC2 R37_DDC1 R37_DDC2 R38_DDC1 R38_DDC2 R39_DDC1 R39_DDC2 R40_DDC1 R40_DDC2 R41_DDC1 R41_DDC2 R42_DDC1 R42_DDC2 R43_DDC1 R43_DDC2 R44_DDC1 R44_DDC2 R45_DDC1 R45_DDC2 R46_DDC1 R46_DDC2 R47_DDC1 R47_DDC2 R48_DDC1 R48_DDC2 R49_DDC1 R49_DDC2: library part "Res 13M", "Resistor 0.1W 1%", LatestRevisionDate=17-Jul-2002, LatestRevisionNote="Re-released for DXP Platform.", PackageDescription="Axial Device, Thru-Hole; 2 Leads; 0.3 in Pin Spacing", PackageReference=AXIAL-0.3, Published=8-Jun-2000, Publisher="Altium Limited"
SJ1 SJ2 SJ3 SJ4 SJ5: library part SJ, "Solder Jumper"
U1: "Fixed Low Drop Positive Voltage Regulator, 3.3V, 4-Pin SOT-223, Tape and Reel", Manufacturer=STMicroelectronics, Manufacturer Part Number=LD1117S33CTR, Supplier Part Number 1=497-1241-1-ND, ComponentLink1Description="Manufacturer URL", ComponentLink1URL=http://www.st.com, ComponentLink2Description=Datasheet, ComponentLink2URL=http://www.st.com/internet/com/TECHNICAL_RESOURCES/TECHNICAL_LITERATURE/DATASHEET/CD00000544.pdf, DatasheetVersion=1/11/2011, PackageDescription="4-Pin SOT-223 Package, 6.5 x 3.5 mm Body, 2.3 mm Pitch, 7 mm Lead Span", PackageReference=SOT-223, PackageVersion=2010, Supplier 1=Digi-Key, Supplier 2=Farnell, Supplier Part Number 2=1467779
U2: "4.096 V, 50 ppm / degC, 50 uA Series (Bandgap) Voltage Reference, -40 to 125 degC, 3-pin SOT-23 (DBZ), Green (RoHS & no Sb/Br)", Manufacturer="Texas Instruments", Manufacturer Part Number=REF3040AIDBZT, Rating=Catalog, Supplier Part Number 1=REF3040AIDBZTCT-ND, Temp Coeff(Max)(ppm/ degree C)=50, Temp Coeff(Typ)(ppm/ degree C)=20, Code_JEDEC=TO-236, ComponentLink1Description="Manufacturer URL", ComponentLink1URL=http://www.ti.com/, ComponentLink2Description=Datasheet, ComponentLink2URL=http://www.ti.com/general/docs/lit/getliterature.tsp?genericPartNumber=REF3040&fileType=pdf, ComponentLink3Description="Package Specification", ComponentLink3URL=http://www.ti.com/litv/pdf/mpds108a, DatasheetVersion=SBVS032F, Eco-Plan="Green (RoHS & no Sb/Br)", Initial Accuracy @ 25/deg C(%)=0.2, Iq(Max)(uA)=50, Mounting Technology="Surface Mount", PackageDescription="3-Pin Plastic Small Outline, Body 2.92 x 1.3 mm, Pitch 0.95 mm", PackageReference=DBZ0003A, PackageVersion=4203227/B, PartNumber=REF3040AIDBZT, SubFamily="Series Voltage Reference", Supplier 1=Digi-Key, Supplier 2=Farnell, Supplier Part Number 2=3124532, VI(Max)(V)=5.5, VI(Min)(V)=4.097, VO(V)=4.096
U3: "High-Speed, Single-Supply, Rail-to-Rail Operational Amplifier MicroAmplifier(TM) Series, 2.7 to 5.5 V, -40 to 85 degC, 8-pin SOP (DGK8), Green (RoHS & no Sb/Br)", Manufacturer="Texas Instruments", Manufacturer Part Number=OPA2350EA/250, Supplier Part Number 1=OPA2350EACT-ND, Total Supply Voltage(Max)(+5V is 5, +/-5V is 10)=5.5, Total Supply Voltage(Min)(+5V is 5, +/-5V is 10)=2.7, CMRR(Min)(dB)=74, Code_JEDEC=MO-187, ComponentLink1Description="Manufacturer URL", ComponentLink1URL=http://www.ti.com/, ComponentLink2Description=Datasheet, ComponentLink2URL=http://www.ti.com/general/docs/lit/getliterature.tsp?genericPartNumber=OPA2350&fileType=pdf, ComponentLink3Description="Package Specification", ComponentLink3URL=http://www.ti.com/litv/pdf/mpds028d, DatasheetVersion=SBOS099C, Eco-Plan="Green (RoHS & no Sb/Br)", IIB(Max)(pA)=10, Iq per channel(Max)(mA)=8.5, Mounting Technology="Surface Mount", Number of Channels=2, Offset Drift(Typ)(uV/C)=4, PackageDescription="8-Pin Thin Small Outline, Body 3 x 3 mm, Pitch 0.65 mm", PackageReference=DGK0008A, PackageVersion="4073329/E, 05/2006", PartNumber=OPA2350EA/250, Slew Rate(Typ)(V/us)=22, Sub Family="Low Input Bias Current Amp (<=10pA), Low Offset Voltage Amplifier (<=500uV), Low Supply Voltage Amplifier (<=2.7V), Precision Amplifier", Supplier 1=Digi-Key, Supplier 2=Farnell, Supplier Part Number 2=3117460, Vio (25C)(Max)(mV)=1, Vn at 1kHz(Typ)(nV/rtHz)=18
U4: "High Speed USB Bridge with Type-C/PD3.0 / Controller", Supplier Part Number 1=895-FT2232HPQ-REEL, Supplier 1=Mouser, Supplier 2=Digi-Key, Supplier Part Number 2=768-FT2232HPQ-REELTR-ND
U5: library part STM32F742VGT6, "High-performance and DSP with DP-FPU, Arm Cortex-M7 MCU with 1MBytes of Flash memory, 692KB RAM, 480 MHz CPU, L1 cache, external memory interface, subset of peripherals", Supplier Part Number 1=511-STM32H742VGT6TR, Supplier 1=Mouser, Supplier 2=Digi-Key, Supplier Part Number 2=497-STM32H742VGT6TR-ND
U6_DDC1 U6_DDC2: library part DDC232, "32 Channel Current-Input 20-Bit ADC, 0 to 70 degC, 64-pin BGA (ZXG64), Green (RoHS & no Sb/Br)", Analog Voltage AV/DD(Max)(V)=5.25, Analog Voltage AV/DD(Min)(V)=4.75, Manufacturer="Texas Instruments", Manufacturer Part Number=DDC232CZXGR, Supplier Part Number 1=296-27544-1-ND, # Input Channels=32, Architecture=Delta-Sigma, ComponentLink1Description="Manufacturer URL", ComponentLink1URL=http://www.ti.com/, ComponentLink2Description=Datasheet, ComponentLink2URL=http://www.ti.com/general/docs/lit/getliterature.tsp?genericPartNumber=DDC232&fileType=pdf, ComponentLink3Description="Package Specification", ComponentLink3URL=http://www.ti.com/litv/pdf/mpbg581, DatasheetVersion=SBAS331D, Digital Supply(Max)(V)=3.6, Digital Supply(Min)(V)=2.7, Eco-Plan="Green (RoHS & no Sb/Br)", Mounting Technology="Surface Mount", PackageDescription="64-Pin Plastic Ball Grid Array, Body 8 x 8 mm, Pitch 0.8 mm", PackageReference=ZXG64, PackageVersion="4206838/A, 02/2005", PartNumber=DDC232CZXGR, Resolution(Bits)=20, Sample Rate (max)(SPS)=3.125k, SubFamily="Low Power, 8-Bit, Dual 1.5 GSPS or Single 3.0 GSPS A/D Converter", Supplier 1=Digi-Key, Supplier 2=Mouser, Supplier Part Number 2=595-DDC232CKZXGT
X1: library part XTAL_12MHz, "Crystal Oscillator", Supplier Part Number 1=535-9826-6-ND, LatestRevisionDate=17-Jul-2002, LatestRevisionNote="Re-released for DXP Platform.", PackageDescription="Crystal, Thru-Hole; 2 Leads; Body 3.1 x 8.2 mm (Dia.xH)", PackageReference=R38, Published=8-Jun-2000, Publisher="Altium Limited", Supplier 1=Digi-Key, Supplier 2=Mouser, Supplier Part Number 2=815-ABM8-12-B2-T
X2: library part XTAL_32kHz, "Crystal Oscillator", Supplier Part Number 1=535-9542-1-ND, LatestRevisionDate=17-Jul-2002, LatestRevisionNote="Re-released for DXP Platform.", PackageReference=R38, Published=8-Jun-2000, Publisher="Altium Limited", Supplier 1=Digi-Key, Supplier 2=Mouser, Supplier Part Number 2=815-ABS07-32.768KHZT
X3: library part XTAL_8MHz, "Crystal Oscillator", Supplier Part Number 1=535-9720-6-ND, LatestRevisionDate=17-Jul-2002, LatestRevisionNote="Re-released for DXP Platform.", PackageDescription="Crystal, Thru-Hole; 2 Leads; Body 3.1 x 8.2 mm (Dia.xH)", PackageReference=R38, Published=8-Jun-2000, Publisher="Altium Limited", Supplier 1=Digi-Key, Supplier 2=Mouser, Supplier Part Number 2=815-ABM3B-8.0-B2-T

## Via types
v1: diameter 0.4, hole 0.2, Top Layer to Bottom Layer, tented both sides, 395 vias

## Nets (pads, with @x,y where several pads share a name; then routed paths per layer and width w, separated by ;. In a path a pad name is that pad's centre, name@x,y a point inside that pad or via, vN(x,y) a via of type N, cw(c..) or ccw(c..) an arc to the next point about the centre after c; other vN are vias at no path point)
1V2: C12.1 C17.1 C18.1 C19.2 C40.2 U4.11 U4.19 U4.22 U4.36 U4.46 U4.56 | length 33.7
  Top Layer w0.15: U4.22@23.25,9.35 23.3,9.4 23.8,9.4 24,9.6 24,10.762 ; U4.19@23.25,10.85 23.912,10.85 24,10.762 ; C40.2@25.45,15.1 25.65,14.9 27.6,14.9 28.3,15.6 30.65,15.6 31.05,15.2 C12.1@31.1,15.2 ; C40.2@25.45,15.45 C40.2@25.5,15.4 ; C40.2@25.5,14.9 25.55,14.85 U4.11@25.55,13.65 ; U4.11@25.6,13.5 25.5,13.4 25.5,13 25.4,12.9 24.282,12.9 24,12.618 24,10.762 ; v1(27.5,6.2) 27.525,6.175 27.525,5.875 U4.36@27.6,5.8 ; U4.46@31.1,7.8 31,7.9 30.8,7.9 30.6,8.1 30.6,12.6 30.8,12.8 31.3,12.8 U4.56@31.35,12.85 31.35,13.451 31.15,13.651 31.15,14.85 C12.1@31.2,14.9 ; v1(31.275,5.402) 31.343,5.402 31.632,5.691 31.692,5.691 32.425,6.424 32.425,7.175 32.4,7.2 32.4,7.85 ; U4.46@31.35,7.85 32.4,7.85 ; C19.2@33.4,8.1 33.4,8 33.25,7.85 32.4,7.85 ; C19.2@33.7,8.6 33.8,8.7 C18.1@33.8,9.4
  Bottom Layer w0.15: C17.1@27.5,6.8 27.5,6.3 v1(27.5,6.2) 28.2,5.5 31,5.5 31.05,5.45 31.227,5.45 v1(31.275,5.402)
3V3: C4.1 C6.1 C20.1 C21.1 C22.1 C23.1 C31.1 C32.1 C33.1 C34.1 C35.1 C36.1 C37.1 C41_DDC1.2 C41_DDC2.2 D1.1 D2.1 FB4.2 FB5.2 J1.2 P5.1 R8.2 R9.2 R10.2 R17.2 SJ1.1 TP4.1 U1.2 U1.4 U4.5 U4.13 U4.14 U4.28 U4.40 U5.6 U5.11 U5.20 U5.21 U5.27 U5.50 U5.75 U5.100 U6_DDC1.B7 U6_DDC2.B7 | length 42
  Top Layer w0.15: U6_DDC1.B7@18,-6.6 18.4,-6.2 18.4,-5.6 18.899,-5.101 18.932,-5.101 19.032,-5 v1(19.1,-5) ; C41_DDC2.2@18.8,6 18.825,5.975 19.267,5.975 v1(19.31,5.932) 19.377,5.932 19.51,5.8 21.05,5.8 21.5,6.25 C22.1@21.5,6.3 ; FB5.2@21.6,7.6 C22.1@21.6,6.4 21.65,6.35 U4.28@23.25,6.35 ; v1(22.8,14.2) 22.848,14.152 23.015,14.152 23.143,14.025 24.05,14.025 24.5,14.025 24.55,13.975 U4.13@24.55,13.65 ; v1(25.9,-11.35) 25.75,-11.35 C20.1@25.6,-11.2 U5.100@27.22,-11.2 ; v1(28.5,14.5) 28.525,14.475 28.525,13.675 U4.5@28.55,13.65 ; v1(28.6,2.5) 28.88,2.5 U5.75@28.9,2.48 ; v1@29.5,6.2 29.525,6.175 29.525,5.575 U4.40@29.55,5.55 ; v1(31.322,-11.916) 31.361,-11.955 31.361,-12.841 U5.6@31.4,-12.88 ; U5.11@33.9,-12.88 33.965,-12.945 33.965,-13.772 34.1,-13.907 v1(34.1,-13.975) ; U5.20@38.4,-12.88 38.42,-12.9 U5.21@38.9,-12.9 ; U5.21@38.9,-12.88 38.9,-11.813 39.1,-11.613 v1(39.1,-11.6) ; v1(41.3,1) 41.313,1 41.513,0.8 U5.50@42.58,0.8 ; U5.27@42.58,-10.7 43.732,-10.7 43.832,-10.8 v1(43.9,-10.8) ; P5.1@46.8,-10.1 47,-10.3 C37.1@47,-12.5 TP4.1@47,-13.2
  Bottom Layer w0.15: U6_DDC2.B7@18,6.6 18.4,6.2 19.1,6.2 19.31,5.99 v1(19.31,5.932) 19.31,5.91 v1@19.3,5.9 ; D1.1@21.95,13.7 22.45,14.2 v1(22.8,14.2) ; R17.2@22.4,-5.2 22.4,-5.25 22.625,-5.475 22.625,-5.645 v1(22.98,-6) ; C23.1@27.2,13.8 27.25,13.8 27.425,13.975 27.425,14.325 27.6,14.5 v1(28.5,14.5) ; v1@28.5,13.1 28.588,13.1 v1(28.59,13.097) 28.59,12.966 28.587,12.963 28.75,12.8 R10.2@28.8,12.8 ; R10.2@28.9,12.8 R8.2@30.8,12.8 ; v1@29.5,6.2 v1(29.5,6.25) C21.1@29.5,6.8 ; R9.2@29.8,12.8 29.8,11.3 U1.4@29.9,11.2 ; C31.1@31.3,-12.5 31.322,-12.478 31.322,-12.031 31.353,-12 v1@31.4,-12 ; FB4.2@33.8,4.8 33.85,4.8 34.25,4.4 34.363,4.4 v1(34.398,4.364) 34.434,4.4 v1@34.5,4.4 ; v1(34.1,-13.975) 34.148,-13.927 34.148,-13.752 C35.1@34.2,-13.7 ; U1.2@35,9.8 U1.2@36.575,9.8 ; U1.2@35.875,9.8 36.3,9.375 v1(36.3,9.1) ; U1.2@36.972,9.403 U1.2@36.575,9.8 ; D2.1@37,14.4 37,14.5 v1(37.4,14.9) ; C6.1@37.8,10 37.6,9.8 U1.2@36.575,9.8 ; C6.1@38.1,10.2 C4.1@39.2,10.2
  other v1: 24.6,-7
AVDD_5V: C2.1 C8.1 C40_DDC1.2 C40_DDC2.2 R1.1 TP3.1 U2.1 U3.8 U6_DDC1.E6 U6_DDC1.F6 U6_DDC1.G6 U6_DDC2.E6 U6_DDC2.F6 U6_DDC2.G6 | length 42.1
  Top Layer w0.15: C40_DDC2.2@13.7,12.35 C2.1@14.7,12.35 ; TP3.1@14.3,14.8 14.3,14.624 14.425,14.499 14.425,14.275 R1.1@14.6,14.1 14.6,12.45 C2.1@14.7,12.35 ; TP3.1@14.3,14.9 TP3.1@14.35,14.95 ; C2.1@14.8,12.3 14.75,12.3 C2.1@14.7,12.35 ; C2.1@14.9,12.35 16.382,12.35 16.4,12.368 v1@16.4,12.4 ; U6_DDC1.G6@17.2,-10.6 17.6,-11 17.6,-12.4 v1(18.1,-12.9) ; U6_DDC1.G6@17.2,-10.5 U6_DDC1.E6@17.2,-9 ; v1(18.5,1.8) 18.8,1.5 U3.8@18.8,1 ; U3.8@18.7,1 U3.8@18.725,0.975
  Layer 1 w0.15: v1(16.5,12.4) 16.5,10.5 18.5,8.5 v1(18.5,1.8) 16.9,0.2 16.9,-3.2 17.3,-3.6 17.3,-12.1 v1(18.1,-12.9)
  Bottom Layer w0.15: v1(16.5,12.4) 17,12.4 17.6,11.8 17.6,11 U6_DDC2.G6@17.2,10.6 U6_DDC2.E6@17.2,9
BOOT0: R16.1 SJ1.2 U5.94 | length 4.1
  Top Layer w0.15: SJ1.2@25.3,-8.1 25.4,-8.2 U5.94@27.22,-8.2 29,-8.2 29.2,-8 v1(29.3,-8)
CTS: TP10.1 U4.26 U5.16 | length 31.2
  Top Layer w0.15: U4.26@23.25,7.35 23.275,7.325 23.875,7.325 v1(23.9,7.3) ; v1(36.001,-7.025) v1(36.001,-7.025) 36.4,-7.426 U5.16@36.4,-12.88 TP10.1@36.4,-14.4
  Bottom Layer w0.15: v1(23.9,7.3) 23.4,6.8 23.4,5.8 24.2,5 25.627,5 26.327,4.3 30.503,4.3 34,0.803 34,-1.821 36.001,-3.823 v1(36.001,-7.025)
D\D\C\_\R\E\S\E\T\: TP28.1 U5.58 U6_DDC1.C7 U6_DDC2.C7 | length 47.3
  Top Layer w0.15: U6_DDC1.C7@18,-7.4 18.4,-7 19.487,-7 19.687,-7.2 v1(19.725,-7.2) ; v1(19.857,4) 20.257,3.6 22.85,3.6 23.225,3.225 23.225,2.551 23.976,1.8 27.4,1.8 28.035,1.165 28.043,1.165 29.056,0.152 36.252,0.152 37.4,1.3 U5.58@37.4,2.48 37.4,3.524 37.6,3.724 TP28.1@37.6,3.9
  Bottom Layer w0.15: U6_DDC2.C7@18,7.4 18.4,7 19.8,7 20.1,6.7 20.1,5.276 19.857,5.033 v1(19.857,4) 19.879,3.979 19.7,3.8 19.7,-0.449 20.2,-0.949 20.2,-5.974 19.65,-6.524 19.65,-6.987 19.677,-7.014 19.677,-7.177 v1@19.7,-7.2 ; v1(19.1,-12.6) 19,-12.5 19,-9.1 19.725,-8.375 v1(19.725,-7.2)
D\D\C\_\V\A\L\I\D\: TP38.1 U5.59 U6_DDC2.H7 | length 30.9
  Top Layer w0.15: v1(22.2,4.075) 22.225,4.1 22.774,4.1 23.525,3.349 23.525,2.675 24.1,2.1 27.532,2.1 29.18,0.452 36.052,0.452 36.9,1.3 U5.59@36.9,2.48
  Bottom Layer w0.15: U6_DDC2.H7@18,11.4 18.425,11.825 ; v1(18.2,13.8) 18.3,13.8 18.425,13.675 18.425,11.825 ; v1@22.2,4.076 21.9,4.376 21.9,7.7 20.5,9.1 20.5,9.586 20.3,9.786 20.3,11.1 19.575,11.825 18.425,11.825
D_N: D6.6 U5.70 | length 6.1
  Top Layer w0.15: U5.70@31.4,2.48 31.44,2.52 31.44,3.233 31.44,3.34 33.275,5.175 33.275,6.026 33.837,6.588 33.961,6.588 34.174,6.375 34.625,6.375 D6.6@34.7,6.3
D_P: D6.4 U5.71 | length 6.8
  Top Layer w0.15: U5.71@30.9,2.48 30.94,2.52 30.94,3.44 32.851,5.351 32.851,6.202 33.661,7.012 33.961,7.012 34.174,7.225 34.625,7.225 D6.4@34.7,7.3
DCD: TP13.1 U4.30 U5.32 | length 29.1
  Top Layer w0.15: U4.30@24.55,5.55 24.6,5.6 24.6,6.1 24.68,6.18 v1(24.68,6.25) 24.68,6.28 v1@24.7,6.3 ; v1(37.7,-6.525) 39.425,-6.525 41.1,-8.2 U5.32@42.58,-8.2 TP13.1@44.2,-8.2
  Bottom Layer w0.15: v1@24.7,6.2 24.73,6.2 25.03,5.9 26,5.9 26.7,5.2 30.876,5.2 34.9,1.176 34.9,-1.424 37.4,-3.924 37.4,-6.224 v1(37.7,-6.525)
DDC_CLK: TP29.1 U5.44 U6_DDC1.F8 U6_DDC2.F8 | length 49.4
  Top Layer w0.15: U6_DDC1.F8@18.8,-9.8 20.099,-9.8 20.174,-9.725 20.176,-9.725 20.187,-9.714 20.387,-9.714 v1(20.434,-9.667) 20.9,-9.202 20.9,-9.082 21.682,-8.3 v1(22.9,-8.3) ; v1(28.8,-6.3) 29.101,-6.299 30.5,-4.9 38.9,-4.9 41.6,-2.2 U5.44@42.58,-2.2 44,-2.2 TP29.1@44.1,-2.1
  Layer 2 w0.15: v1(22.9,-8.3) 26.8,-8.3 v1(28.8,-6.3)
  Bottom Layer w0.15: U6_DDC2.F8@18.8,9.8 18.836,9.764 19.049,9.764 19.6,9.213 19.6,8.727 21,7.327 21,-0.036 21.1,-0.136 21.1,-7.5 20.9,-7.7 20.9,-9.2 20.434,-9.666 v1(20.434,-9.667)
DDC_CLK_CFG: TP31.1 U5.78 U6_DDC1.F7 U6_DDC2.F7 | length 30.4
  Top Layer w0.15: U6_DDC1.F7@18,-9.8 18.4,-9.4 19.857,-9.4 19.957,-9.3 v1(20.025,-9.3) ; TP31.1@20.6,0 20.776,0 21.001,-0.225 23.875,-0.225 24.3,0.2 26,0.2 26.351,-0.151 27.171,-0.151 U5.78@27.22,-0.2
  Bottom Layer w0.15: U6_DDC2.F7@18,9.8 18.405,9.395 18.994,9.395 19.3,9.089 19.3,8.603 20.7,7.203 20.7,3.375 20.5,3.175 v1(20.5,-0.1) ; v1(20.025,-9.3) 20.025,-9.275 20.6,-8.7 20.6,-7.5 20.8,-7.3 20.8,-0.7 20.501,-0.401 v1@20.501,-0.101
DDC_CONV: TP34.1 U5.64 U6_DDC1.A8 U6_DDC2.A8 | length 33.1
  Top Layer w0.15: U6_DDC1.A8@18.8,-5.8 18.823,-5.777 19.187,-5.777 19.364,-5.6 v1(19.4,-5.6) ; v1(19.1,5.4) 19.5,5.4 20.4,4.5 22.85,4.5 23.825,3.525 23.825,2.849 24.274,2.4 27.7,2.4 29.348,0.752 33.752,0.752 34.4,1.4 U5.64@34.4,2.48 34.449,2.529 34.449,3.349 TP34.1@35,3.9
  Bottom Layer w0.15: U6_DDC2.A8@18.8,5.8 18.8,5.787 19.1,5.487 v1(19.1,5.4) 19.1,-0.701 19.6,-1.201 19.6,-5.332 19.4,-5.532 v1(19.4,-5.6)
DDC_DCLK: TP32.1 U5.29 U6_DDC1.H8 U6_DDC2.H8 | length 56.5
  Top Layer w0.15: U6_DDC1.H8@18.8,-11.4 v1(19.8,-11.4) 19.8,-12.5 20.6,-13.3 TP32.1@23.3,-13.3 ; TP32.1@23.5,-13.6 25.6,-13.6 27,-15 34.4,-15 34.8,-15.4 38.299,-15.4 38.636,-15.062 40.638,-15.062 41.9,-13.8 41.9,-11.776 41.5,-11.376 41.5,-9.9 41.7,-9.7 U5.29@42.58,-9.7
  Bottom Layer w0.15: U6_DDC2.H8@18.8,11.4 19.1,11.1 19.7,11.1 20,10.8 20,9.662 20.2,9.461 20.2,8.976 21.6,7.576 21.6,0.212 21.7,0.112 21.7,-7.9 21.5,-8.1 21.5,-10.301 20.401,-11.4 v1(19.8,-11.4)
DDC_DIN_CFG: U5.36 U6_DDC1.G7 U6_DDC2.G7 | length 53
  Top Layer w0.15: U6_DDC1.G7@18,-10.6 18.4,-10.2 v1(20.3,-10.201) ; v1(20.3,-10.201) 20.8,-10.7 20.8,-12.3 21.2,-12.7 23.051,-12.7 23.976,-11.775 27.833,-11.775 30.721,-8.886 30.721,-8.879 33.8,-5.8 39.724,-5.8 40.099,-6.175 42.555,-6.175 U5.36@42.58,-6.2
  Bottom Layer w0.15: U6_DDC2.G7@18,10.6 18.4,10.2 19.037,10.2 19.9,9.337 19.9,8.851 21.3,7.451 21.3,0.088 21.4,-0.012 21.4,-7.7 21.2,-7.9 21.2,-9.6 20.6,-10.2 v1(20.3,-10.201)
DDC_DOUT: TP33.1 U5.30 U6_DDC2.D8 | length 52.2
  Top Layer w0.15: v1(20.3,-10.9) 20.3,-12.4 20.9,-13 23.176,-13 23.201,-12.975 25.475,-12.975 27.2,-14.7 34.7,-14.7 35.025,-15.025 37.859,-15.025 38.121,-14.762 40.513,-14.762 41.6,-13.676 41.6,-11.9 41.2,-11.5 41.2,-9.776 41.711,-9.265 41.935,-9.265 U5.30@42,-9.2 ; U5.30@42.58,-9.2 42.645,-9.265 43.365,-9.265 TP33.1@44,-9.9
  Bottom Layer w0.15: U6_DDC2.D8@18.8,8.2 19.279,8.2 20.4,7.079 20.4,3.554 20,3.154 20,-0.325 20.5,-0.825 20.5,-7.1 20.2,-7.4 20.2,-7.975 v1(20.175,-8) 20.175,-8.425 19.6,-9 19.6,-10.2 v1@20.2,-10.8
DSR: TP12.1 U4.29 U5.18 | length 30.3
  Top Layer w0.15: U4.29@24.05,5.55 24.05,4.875 24.3,4.625 v1(24.3,4.575) ; v1(35.5,-6.725) 35.548,-6.677 35.748,-6.677 35.825,-6.6 37,-6.6 37.4,-7 U5.18@37.4,-12.88 37.465,-12.945 37.465,-13.565 37.876,-13.976 38.376,-13.976 TP12.1@38.4,-14 ; TP12.1@38.3,-14.1 TP12.1@38.3,-14
  Bottom Layer w0.15: v1(24.3,4.575) 24.368,4.575 24.493,4.7 25.5,4.7 26.2,4 30.379,4 33.7,0.679 33.7,-1.946 35.5,-3.746 v1(35.5,-6.725)
DTR: TP11.1 U4.27 U5.17 | length 30.5
  Top Layer w0.15: U4.27@23.25,6.85 23.3,6.8 23.802,6.8 23.9,6.702 v1@23.9,6.7 ; v1(36.601,-7.025) 36.601,-7.027 36.9,-7.327 U5.17@36.9,-12.88 36.9,-13.8 37.4,-14.3 TP11.1@37.4,-14.4
  Bottom Layer w0.15: 23.901,6.501 23.8,6.4 23.8,5.876 24.376,5.3 25.751,5.3 26.451,4.6 30.627,4.6 34.3,0.927 34.3,-1.697 36.601,-3.998 v1(36.601,-7.025)
  other v1: 23.949,6.721
GND: C1.2 C2.2 C3.2 C4.2 C5.2 C6.2 C7.2 C8.2 C9.2 C10.2 C11.2 C12.2 C13.1 C14.1 C15.2 C16.2 C17.2 C18.2 C19.1 C20.2 C21.2 C22.2 C23.2 C24.2 C25.2 C26.1 C27.1 C28.2 C29.1 C30.1 C31.2 C32.2 C33.2 C34.2 C35.2 C36.2 C37.2 C38.2 C38_DDC1.2 C38_DDC2.2 C39.2 C39_DDC1.2 C39_DDC2.2 C40.1 C40_DDC1.1 C40_DDC2.1 C41.1 C41_DDC1.1 C41_DDC2.1 C42.1 D3.2 D4.2 D5.2 D6.2 FB1.2 J1.3 P1.1 P1.18 P1.19 P1.20 P2.1 P2.18 P2.19 P2.20 P3.1 P3.18 P3.19 P3.20 P4.1 P4.18 P4.19 P4.20 P5.2@46.8,1.15 R11.2 R15.1 R16.2 R18.1 TP1.1 U1.1 U2.3 U3.4 U4.4 U4.12 U4.17 U4.41 U4.TB U5.10 U5.19 U5.26 U5.49 U5.74 U5.99 U6_DDC1.A5 U6_DDC1.A7 U6_DDC1.B5 U6_DDC1.B8 U6_DDC1.C5 U6_DDC1.C6 U6_DDC1.C8 U6_DDC1.D5 U6_DDC1.D6 U6_DDC1.D7 U6_DDC1.E5 U6_DDC1.E7 U6_DDC1.F5 U6_DDC1.G5 U6_DDC1.G8 U6_DDC1.H5 U6_DDC1.H6 U6_DDC2.A5 U6_DDC2.A7 U6_DDC2.B5 U6_DDC2.C5 U6_DDC2.C6 U6_DDC2.C8 U6_DDC2.D5 U6_DDC2.D6 U6_DDC2.D7 U6_DDC2.E5 U6_DDC2.E7 U6_DDC2.F5 U6_DDC2.G5 U6_DDC2.G8 U6_DDC2.H5 U6_DDC2.H6 | length 74.7
  Top Layer w0.15: P2.18@5.05,-11.25 5.05,-11.55 v1(5.1,-11.6) ; P2.1@5.05,-2.75 5.075,-2.725 5.9,-2.725 v1(5.925,-2.7) ; P1.18@5.05,2.75 v1(5.95,2.75) v1@6,2.8 ; P1.1@5.05,11.25 5.062,11.25 5.137,11.325 5.137,11.537 v1(5.2,11.6) ; C10.2@12.7,-0.6 12.7,-1.5 C39_DDC2.2@12.8,-1.6 ; C10.2@12.8,-0.6 13.1,-0.6 13.5,-1 14.25,-1 U3.4@14.275,-0.975 ; C40_DDC2.1@13.6,10.95 C40_DDC2.1@13.7,10.85 ; C40_DDC2.1@14.1,11 14.1,11.1 14.2,11.2 C2.2@14.9,11.2 C2.2@15,11.1 ; U6_DDC1.A5@16.4,-5.8 U6_DDC1.D5@16.4,-8.2 ; U6_DDC1.H6@17.2,-11.4 U6_DDC1.H5@16.4,-11.4 U6_DDC1.D5@16.4,-8.2 ; U6_DDC1.D6@17.2,-8.2 U6_DDC1.D5@16.4,-8.2 ; U6_DDC1.C6@17.2,-7.4 U6_DDC1.D7@18,-8.2 ; U6_DDC1.E7@18,-9 v1(18,-8.6) U6_DDC1.D7@18,-8.2 ; U6_DDC1.A7@18,-5.8 18,-5.5 18.4,-5.1 18.4,-4.2 v1(19.1,-3.5) ; U6_DDC1.G8@18.8,-10.6 19.331,-10.6 19.432,-10.701 v1(19.499,-10.701) ; U6_DDC1.C8@18.8,-7.4 U6_DDC1.D7@18,-8.2 ; U6_DDC1.B8@18.8,-6.6 19.775,-6.6 19.837,-6.662 20.037,-6.662 v1(20.075,-6.7) ; C41_DDC2.1@18.9,7.7 v1(19.178,7.7) ; C22.2@20.6,6.4 C22.2@20.6,6.45 ; C14.1@20.6,9.7 C14.1@20.725,9.825 ; D4.2@22,-9.75 22.5,-9.25 v1(22.5,-9) ; D3.2@22,-6.95 22.5,-7.45 v1(22.5,-7.7) ; v1(22.6,11.9) 22.625,11.875 23.225,11.875 U4.17@23.25,11.85 ; C40.1@24.1,14.7 24.125,14.675 24.525,14.675 25,14.2 25,13.7 U4.12@25.05,13.65 ; v1(24.5,-10.7) 24.5,-11.1 C20.2@24.6,-11.2 ; C20.2@24.7,-11 24.75,-11 24.775,-10.975 24.775,-10.925 25.065,-10.635 27.155,-10.635 U5.99@27.22,-10.7 ; 28.975,14.5 28.975,14.325 29.05,14.25 U4.4@29.05,13.65 29.05,12.35 U4.TB@29.1,12.3 ; v1(29.4,1.4) U5.74@29.4,2.48 ; U4.41@30.05,5.55 30.05,6.75 U4.TB@30.1,6.8 ; C24.2@34.8,5.1 34.8,5.15 35.1,5.45 v1(35.1,5.5) ; v1@35.125,5.475 35.4,5.75 35.4,6.468 35.657,6.725 36.025,6.725 D6.2@36.1,6.8 ; R11.2@35.4,12.1 C38.2@35.4,13 35.4,13.025 35.575,13.2 35.8,13.2 ; D5.2@36.1,10.7 36.125,10.675 36.505,10.675 v1(36.505,10.7) ; U5.19@37.9,-12.88 37.9,-11.813 38.1,-11.613 v1(38.1,-11.6) ; FB1.2@38,14.3 38.1,14.4 C28.2@39.4,14.4 ; v1(41.3,0.1) 41.313,0.1 41.513,0.3 U5.49@42.58,0.3 ; U5.26@42.58,-11.2 43.5,-11.2 v1(43.9,-11.6) ; v1(43.3,14.4) R15.1@43.7,14.4 ; v1(45.6,-12.5) C37.2@46,-12.5
  Bottom Layer w0.15: P3.1@5.05,-11.25 5.1,-11.3 v1(5.1,-11.6) ; P3.18@5.05,-2.75 5.075,-2.725 5.9,-2.725 v1(5.925,-2.7) ; P4.1@5.05,2.75 5.85,2.75 v1@5.9,2.7 ; P4.18@5.05,11.25 5.125,11.25 5.2,11.325 v1(5.2,11.6) ; v1(11.1,0.4) C38_DDC1.2@12,0.4 ; U6_DDC2.A5@16.4,5.8 16.4,7 ; 16.6,11.4 U6_DDC2.H6@17.2,11.4 ; 16.644,11.4 U6_DDC2.H5@16.4,11.4 U6_DDC2.G5@16.4,10.6 U6_DDC2.D5@16.4,8.2 ; v1(16.8,7) 16.4,7 ; U6_DDC2.C6@17.2,7.4 U6_DDC2.D7@18,8.2 U6_DDC2.C8@18.8,7.4 18.854,7.4 19.154,7.7 v1(19.178,7.7) ; U6_DDC2.D6@17.2,8.2 U6_DDC2.D5@16.4,8.2 ; C9.2@17.3,0.3 C8.2@17.3,1.4 ; U6_DDC2.A7@18,5.8 18,5.243 18.075,5.168 v1(18.075,5.1) ; U6_DDC2.D7@18,8.3 U6_DDC2.E7@18,9 ; U6_DDC2.G8@18.8,10.6 19.407,10.6 v1@19.507,10.5 ; v1@19.575,10.5 v1(19.575,10.35) 19.6,10.375 v1@19.6,10.5 ; C25.2@22.4,-4.2 22.5,-4.1 v1(22.5,-3.7) ; v1(29.4,1.4) 29.425,1.425 29.425,1.825 C32.2@29.6,2 ; R16.2@30.6,-7.7 C15.2@30.6,-8.8 ; 30.8,-9.5 30.6,-9.3 C15.2@30.6,-8.8 ; 31.4,-9.5 31.6,-9.3 C16.2@31.6,-8.8 C15.2@30.6,-8.8 ; v1(32.15,5.3) 32.25,5.3 32.75,4.8 C39.2@32.8,4.8 ; C31.2@32.3,-12.5 32.3,-12.55 32.475,-12.725 32.525,-12.725 33.399,-13.599 v1(33.4,-13.9) ; C35.2@35.4,-13.3 C29.1@35.4,-12.3 ; 37.2,9 37.8,9 C3.2@37.9,9.1 C1.2@39.3,9.1 ; C6.2@38.1,11.2 38.6,11.2 38.875,11.475 C4.2@38.9,11.5 ; C30.1@38.3,-8.5 v1(38.3,-8) ; 16.4,7 U6_DDC2.D5@16.4,8.2